# Allegro board pocketbeagle2 revA_241205.brd
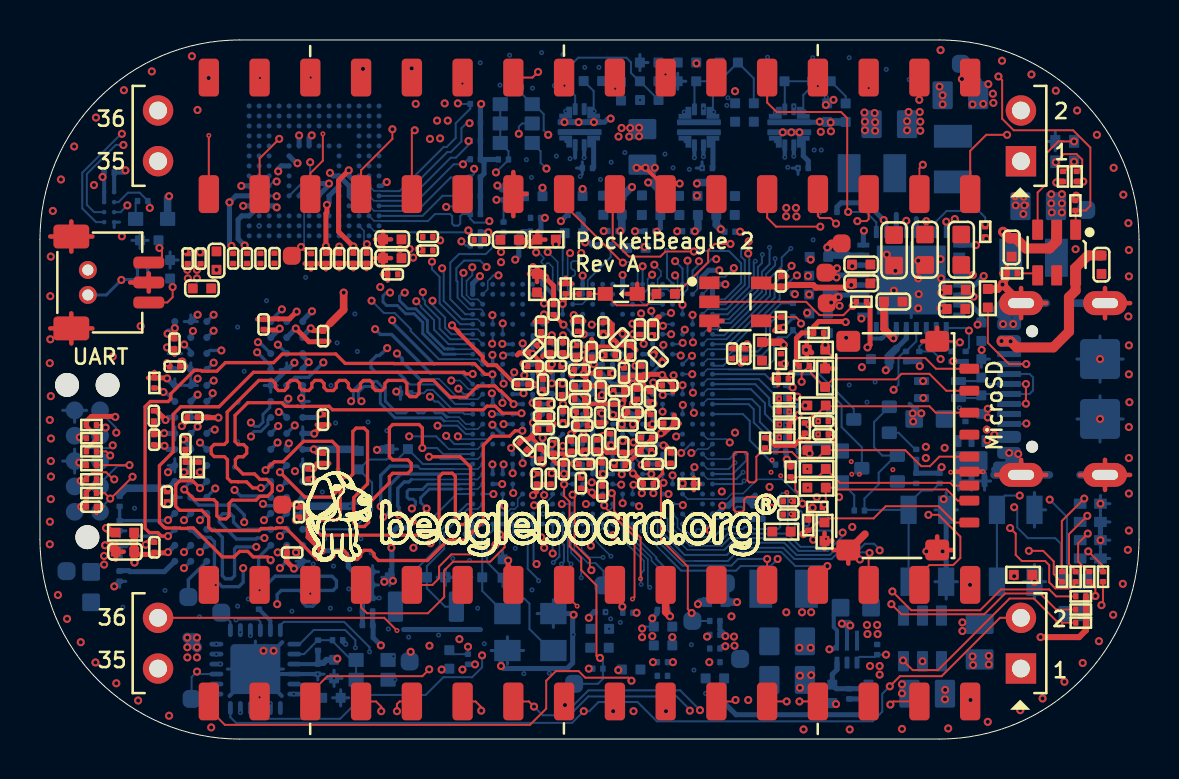
[diagram p0: board, top side]
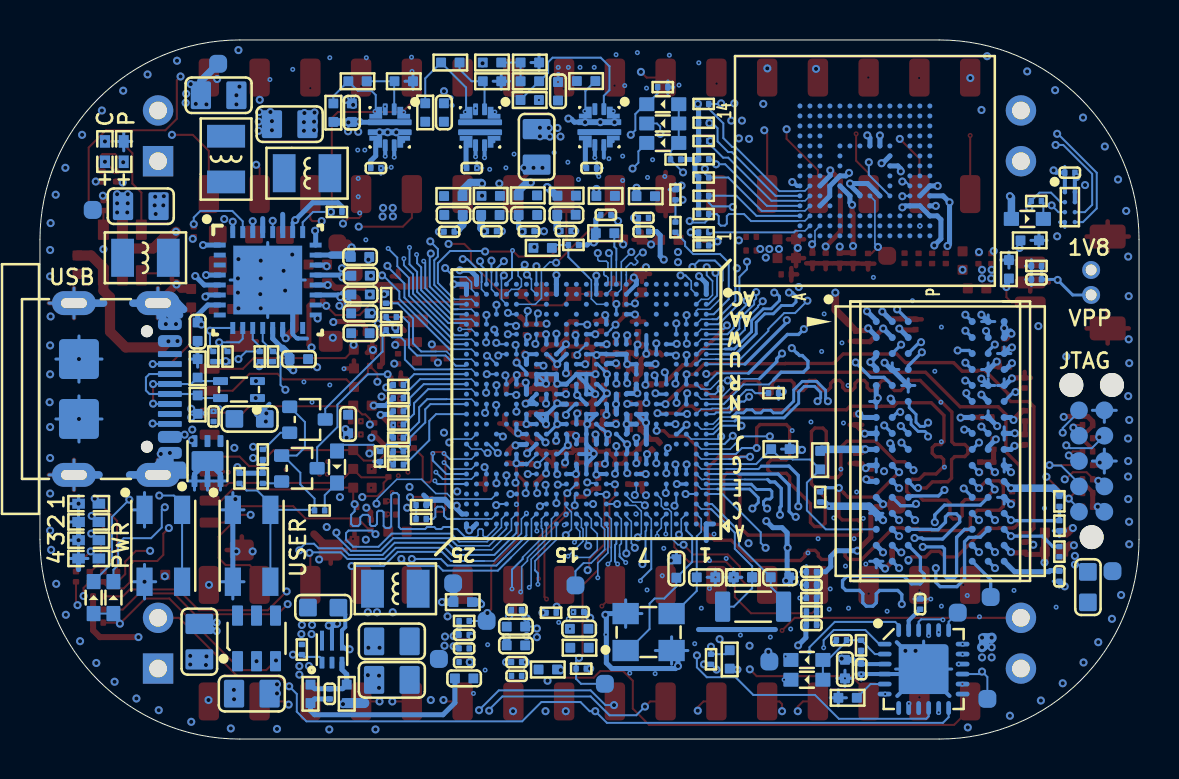
[diagram p1: board, bottom side, seen from below]

Outline 55 x 35 mm; copper layers: TOP, LYR2_GND, LYR3, LAY4_G, LAY5_PWR1, LAY6_PWR2, LYR7, LAY8, LYR9_GND, BOTTOM. Coordinates in mm from the lower left corner of the outline.
Outline path: 0,25 arc(2.93,32.07) 10,35 45,35 arc(52.07,32.07) 55,25 55,10 arc(52.07,2.93) 45,0 10,0 arc(2.93,2.93) 0,10 0,25

## Design rules (mm)
constraint set DEFAULT: min track width 0.102
net group DDR_LDQS: nets DDR_LDQS_N DDR_LDQS_P
net group DDR_UDQS: nets DDR_UDQS_N DDR_UDQS_P
net group DRXD: nets DRXD N17970480
net group EMMC_CLK: nets EMMC_CLK EMMC_CLK_S
net group GPIO0_4: nets GPIO0_4 N17713636
net group GPIO0_5: nets GPIO0_5 N17713634
net group N17714626: nets N17714626 N17714640
net group SD_PWR_EN: nets N17823731 SD_PWR_EN
net group USB0_DP: nets USB0_DM USB0_DP
net group USB1_DP: nets USB1_DM USB1_DP
net group USB_C_DP: nets USB_C_DM USB_C_DP
net group VDDA_1V8: nets VDDA_1V8 VDDA_PLL2
net group VIN_5V: nets N17852744 N17852767
net group AB10: nets AB10 N17951154 USB1_VBUS
net group DDR_ADDR: nets DDR_A0 DDR_A1 DDR_A2 DDR_A3 DDR_A4 DDR_A5 DDR_A6 DDR_A7 DDR_A8 DDR_A9 DDR_A10 DDR_A11 DDR_A12 DDR_A13 DDR_A14_WEN DDR_A15_CAS DDR_A16_RAS DDR_ACTN DDR_BA0 DDR_BA1 DDR_CKE DDR_CSN DDR_ODT DDR_PARITY DDR_RESET#
net group DDR_ADDR_1: nets DDR_ALERTN DDR_BG0 DDR_CLKN DDR_CLKP DDR_TEN
net group GPIO0_6: nets N17713632
net group MG1_DDR_D0: nets DDR_DQ0 DDR_DQ1 DDR_DQ2 DDR_DQ3 DDR_DQ4 DDR_DQ5 DDR_DQ6 DDR_DQ7 DDR_LDM
net group MG1_DDR_D1: nets DDR_DQ8 DDR_DQ9 DDR_DQ10 DDR_DQ11 DDR_DQ12 DDR_DQ13 DDR_DQ14 DDR_DQ15 DDR_UDM
net group POWER: nets A5 A18 A19 A20 AA19 AB20 AB22 AC21 AC24 AD18 AD22 AD23 AD24 AE21 AE22 AE23 AIN5 AIN7 B5 D14 D20 E14 GPIO0_3 GPIO0_6 J23 J25 MCU_GPIO0_1 MCU_SPI0_CLK MCU_SPI0_CS0 MCU_SPI0_D0 MCU_SPI0_D1 N20 VDD_1V8 VDD_SD WKUP_I2C0_SCL WKUP_I2C0_SDA Y25
net group PWR_BTN: nets PWR_BTN VDD_3V3_EN VSYS
net group RESETSTATZ: nets EMMC_RSTN GPIO1_50 N8502406 N17861988 PORZ_OUT RESETSTATZ
net group SD: nets SD_CLK SD_CMD SD_D0 SD_D1 SD_D2 SD_D3
net group USB_5V: nets N16646883 N17855551 N17855593
net group USER_BTN: nets BOOTMODE3 N17806286 USER_BTN
net group VBAT: nets CHG_N N17749261 N17856818 N17856864 N17856912 N17858761

## Placement (name value [footprint] x y rotation side)
C1  20pF  [C0402]  17.97 8.1 180 bottom
C2  20pF  [C0402]  19.82 8.1 0 bottom
C3  8pF  [C0402]  21.67 8.1 180 bottom
C4  8pF  [C0402]  23.15 8.54 90 bottom
C5  100nF  [C0201]  2.57 11.63 0 top
C6  1uF  [C0402]  53.12 23.75 270 top
C7  1uF  [C0402]  48.62 24.61 270 top
C8  100nF  [C0201]  3.46 28.36 0 bottom
C9  1uF  [C0402]  39.39 31.36 90 bottom
C10  1uF  [C0402]  34.79 31.37 90 bottom
C11  100pF  [C0201]  40.5 2.26 270 bottom
C12  10nF  [C0201]  38.19 28.59 180 bottom
C13  10nF  [C0201]  33.39 28.59 180 bottom
C14  10nF  [C0201]  27.4 28.59 180 bottom
C15  22uF  [C0805]  30.15 29.65 270 bottom
C16  1nF  [C0201]  14.89 4.95 0 bottom
C17  10uF  [C0402]  14.72 3.5 270 bottom
C18  100nF  [C0201]  13.9 3.5 270 bottom
C19  470nF  [C0201]  10.96 6.76 90 bottom
C20  1uF  [C0402]  29.08 32.43 90 bottom
C21  100nF  [C0201]  37.08 22.91 90 top
C22  100nF  [C0201]  5.13 23.01 0 bottom
C31  22uF  [C0805]  44.4 2.27 180 bottom
C32  22uF  [C0805]  47.02 4.88 270 bottom
C33  4.7uF  [C0402]  39.58 15.77 90 bottom
C34  100nF  [C0201]  39.2 15.25 180 top
C35  100nF  [C0201]  39.2 15.91 180 top
C44  10uF  [C0603]  44.51 16.03 180 bottom
C46  2.2uF  [C0402]  38.98 24.14 180 bottom
C47  2.2uF  [C0402]  38.96 23.2 180 bottom
C48  2.2uF  [C0402]  38.95 22.26 180 bottom
C49  2.2uF  [C0402]  47.11 20.39 270 bottom
C50  47uF  [C0805]  49.95 26.68 180 bottom
C52  2.2uF  [C0402]  42.7 21.9 0 top
C53  2.2uF  [C0402]  42.05 19.02 180 bottom
C54  47uF  [C0805]  42.5 30.78 0 bottom
C58  100nF  [C0201]  14.17 20.17 270 top
C59  100nF  [C0201]  5.72 9.6 90 top
C60  47uF  [C0805]  46.06 32.23 180 bottom
C62  10uF  [C0603]  46.1 24.5 90 top
C63  10uF  [C0603]  44.29 24.5 270 top
C64  10uF  [C0603]  42.74 24.47 270 top
C65  100nF  [C0201]  7.39 24.06 90 top
C66  100nF  [C0201]  8.04 24.05 90 top
C67  100nF  [C0201]  14.98 24.07 270 top
C68  100nF  [C0201]  14.31 24.07 270 top
C69  4.7uF  [C0402]  8.11 22.56 0 top
C70  100nF  [C0201]  10.36 24.06 270 top
C71  100nF  [C0201]  9.67 24.06 270 top
C72  100nF  [C0201]  11.03 24.06 270 top
C73  100nF  [C0201]  15.68 24.07 270 top
C74  100nF  [C0201]  11.73 24.07 270 top
C75  4.7uF  [C0402]  8.83 23.96 270 top
C76  100nF  [C0201]  16.34 24.07 270 top
C80  2.2uF  [C0402]  4.25 9.38 180 top
C81  10nF  [C0201]  6.74 18.65 0 top
C82  10nF  [C0201]  7.28 14.76 90 top
C99  10nF  [C0201]  13.43 13.27 90 top
C100  10nF  [C0201]  5.72 14.99 90 top
C101  10nF  [C0201]  3.99 8.15 270 bottom
C102  10nF  [C0201]  6.73 19.79 270 top
C103  2.2uF  [C0402]  45.87 22.49 180 top
C109  22uF  [C0603]  2.56 7.61 270 bottom
C112  2.2uF  [C0402]  41.09 22.82 0 top
C113  2.2uF  [C0402]  45.84 21.53 180 top
C114  10nF  [C0201]  11.19 20.76 90 top
C115  10nF  [C0201]  5.7 16.18 270 top
C116  10nF  [C0201]  14.17 15.99 270 top
C117  10nF  [C0201]  12.62 9.34 180 top
C118  10nF  [C0201]  6.35 12.13 270 top
C119  10nF  [C0201]  7.63 16.11 180 top
C120  10nF  [C0201]  14.17 14.06 270 top
C121  100nF  [C0201]  16.39 5.71 180 bottom
C122  100nF  [C0201]  16.39 7.71 0 bottom
C123  100nF  [C0201]  12.97 11.36 270 top
C124  100nF  [C0201]  16.39 8.37 0 bottom
C125  2.2uF  [C0402]  41.1 23.76 0 top
C130  100nF  [C0201]  46.31 16.15 90 bottom
C132  10uF  [C0402]  38.97 21.31 180 bottom
C133  10uF  [C0603]  40.83 6.58 180 bottom
C134  22uF  [C0805]  37.39 2.96 0 bottom
C135  22uF  [C0805]  37.39 4.89 0 bottom
C136  1uF  [C0201]  25.56 13.02 270 top
C137  1uF  [C0201]  27.23 13.77 0 top
C138  1uF  [C0201]  31.56 14.07 270 top
C139  1uF  [C0201]  30.66 13.77 0 top
C140  1uF  [C0201]  24.66 18.67 0 top
C141  1uF  [C0201]  31.4 17.7 0 top
C142  1uF  [C0201]  30.02 20.51 90 top
C143  1uF  [C0201]  30.35 15.09 0 top
C144  1uF  [C0201]  29.03 13.71 0 top
C145  100nF  [C0201]  28.04 6.36 0 bottom
C146  10nF  [C0201]  24.86 13.03 270 top
C147  4.7uF  [C0402]  28.02 5.52 0 bottom
C148  100nF  [C0201]  34.52 25.4 180 bottom
C149  10nF  [C0201]  28.53 19.21 0 top
C150  4.7uF  [C0402]  34.31 26.24 180 bottom
C151  100nF  [C0201]  30.53 25.42 0 bottom
C152  10nF  [C0201]  26.84 19.45 270 top
C153  4.7uF  [C0402]  30.58 26.24 0 bottom
C154  100nF  [C0201]  30.44 12.78 0 top
C155  100nF  [C0201]  24.8 26.09 0 bottom
C156  10nF  [C0201]  25.82 18.68 180 top
C157  1uF  [C0201]  24.79 25.41 0 bottom
C158  100nF  [C0201]  34.64 19.3 90 top
C159  10nF  [C0201]  28.27 18.32 180 top
C160  1uF  [C0201]  35.3 19.29 90 top
C161  100nF  [C0201]  37.45 11.9 0 top
C162  10nF  [C0201]  28.03 16.1 270 top
C163  1uF  [C0201]  37.45 11.24 0 top
C164  100nF  [C0201]  31.15 3.85 0 bottom
C165  10nF  [C0201]  26.19 16.14 90 top
C166  1uF  [C0201]  31.15 3.17 0 bottom
C167  100nF  [C0201]  26.18 19.6 270 top
C168  10nF  [C0201]  25.54 19.6 270 top
C169  1uF  [C0201]  26.68 26.25 0 bottom
C170  100nF  [C0201]  32.41 25.42 0 bottom
C171  10nF  [C0201]  28.19 20.61 90 top
C172  4.7uF  [C0402]  32.46 26.24 0 bottom
C173  100nF  [C0201]  28.68 25.43 0 bottom
C174  10nF  [C0201]  25.71 21.5 90 top
C175  4.7uF  [C0402]  28.65 26.25 0 bottom
C176  100nF  [C0201]  28.07 17.42 90 top
C177  1uF  [C0201]  31.16 6.47 0 bottom
C178  4.7uF  [C0402]  38.97 20.32 180 bottom
C179  4.7uF  [C0402]  31.18 5.63 0 bottom
C180  100nF  [C0201]  27.88 14.72 270 top
C181  100nF  [C0201]  25.07 20.65 90 top
C182  100nF  [C0201]  25.23 16.8 180 top
C183  100nF  [C0201]  28.54 15.02 270 top
C184  100nF  [C0201]  29.65 16.36 0 top
C185  100nF  [C0201]  26.59 14.67 270 top
C186  100nF  [C0201]  29.87 17.27 90 top
C187  100nF  [C0201]  27.09 16.36 0 top
C188  100nF  [C0201]  29.4 15.7 0 top
C189  100nF  [C0201]  27.14 15.7 0 top
C190  100nF  [C0201]  29.54 19.45 90 top
C191  100nF  [C0201]  29.23 18.33 270 top
C192  100nF  [C0201]  26.99 18.49 0 top
C193  100nF  [C0201]  24.69 19.53 225 top
C194  100nF  [C0201]  25.04 14.27 90 top
C195  100nF  [C0201]  27.04 17.68 0 top
C196  100nF  [C0201]  27.01 17.02 0 top
C197  100nF  [C0201]  26.11 17.49 270 top
C198  100nF  [C0201]  27.61 19.38 90 top
C199  100nF  [C0201]  28.73 16.5 90 top
C200  100nF  [C0201]  28.97 17.42 0 top
C201  100nF  [C0201]  29.19 14.61 270 top
C202  100nF  [C0201]  27.22 14.72 270 top
C203  10uF  [C0402]  31.18 4.69 0 bottom
C205  100nF  [C0201]  24.19 14.67 135 top
C206  10uF  [C0402]  33.77 3.04 180 bottom
C207  1uF  [C0201]  33.77 3.85 180 bottom
C208  100nF  [C0201]  26.92 20.67 90 top
C209  100nF  [C0201]  33.77 4.54 180 bottom
C210  100nF  [C0201]  28.12 13.57 90 top
C211  100nF  [C0201]  31.47 15.8 0 top
C212  100nF  [C0201]  25.7 14.57 270 top
C213  100nF  [C0201]  30.56 16 90 top
C214  4.7uF  [C0402]  23.5 24.99 0 top
C215  1uF  [C0201]  21.98 24.99 180 top
C216  100nF  [C0201]  26.21 13.51 90 top
C217  100nF  [C0201]  30.12 18.42 270 top
C218  100nF  [C0201]  30.53 17.14 90 top
C219  100nF  [C0201]  30.33 14.44 180 top
C220  100nF  [C0201]  28.97 20.08 225 top
C221  100nF  [C0201]  27.07 12.81 270 top
C222  100nF  [C0201]  30.94 19.13 135 top
C223  100nF  [C0201]  30.68 20.49 90 top
C224  4.7uF  [C0402]  17.63 24.08 180 top
C225  1uF  [C0201]  17.65 23.27 180 top
C226  100nF  [C0201]  25.17 17.75 90 top
C227  100nF  [C0201]  25.23 16.16 180 top
C228  100nF  [C0201]  25.21 15.52 180 top
C229  100nF  [C0201]  19.41 24.46 0 top
C230  100nF  [C0201]  19.41 25.14 0 top
C231  10uF  [C0402]  17.63 25.02 180 top
C270  100nF  [C0201]  33.77 5.22 180 bottom
C272  100nF  [C0201]  28.14 12.41 270 top
C273  100nF  [C0201]  24.16 17.76 180 top
D1  LRB520S-30T1G  [SOD_523]  40.13 13.62 270 bottom
D2  TPD1E1B04DPYR  [D0402]  38.86 13.52 0 top
D3  MM5Z3V3T1G  [SOD_523]  29.09 22.29 180 top
D4  LRB520S-30T1G  [SOD_523]  16.62 2.97 0 bottom
D5  LRB520S-30T1G  [SOD_523]  16.62 3.96 0 bottom
D6  LRB520S-30T1G  [SOD_523]  5.59 26.04 180 bottom
D7  TPD1E1B04DPYR  [D0402]  5.47 24.97 0 bottom
D8  TPD1E1B04DPYR  [D0402]  6.51 23.52 270 bottom
D16  LRB520S-30T1G  [SOD_523]  51.32 7.08 90 bottom
D17  LRB520S-30T1G  [SOD_523]  52.31 7.08 90 bottom
D19  TPD1E1B04DPYR  [D0402]  38.83 19.49 0 top
D20  TPD1E1B04DPYR  [D0402]  39.29 18.09 270 top
D21  TPD1E1B04DPYR  [D0402]  38.86 16.7 0 top
D22  TPD1E1B04DPYR  [D0402]  38.86 14.46 0 top
D23  TPD1E1B04DPYR  [D0402]  38.86 12.58 0 top
D24  TPD1E1B04DPYR  [D0402]  47.11 18.56 270 bottom
D25  TPD1E1B04DPYR  [D0402]  47.11 16.74 90 bottom
D26  TPD1E1B04DPYR  [D0402]  39.26 10.38 90 top
D47  LRB520S-30T1G  [SOD_523]  23.83 31.78 0 bottom
D48  LRB520S-30T1G  [SOD_523]  23.83 30.82 0 bottom
D56  LRB520S-30T1G  [SOD_523]  23.83 29.84 0 bottom
FB4  120R  [L0402]  4.25 10.34 0 top
FB6  120R  [L0402]  28 4.57 180 bottom
FB7  120R  [L0402]  34.32 27.19 0 bottom
FB8  120R  [L0402]  30.59 27.22 180 bottom
FB9  120R  [L0402]  33.84 6.86 180 bottom
FB10  120R  [L0402]  24.68 27.18 180 bottom
FB11  120R  [L0402]  36.13 19.41 270 top
FB12  120R  [L0402]  37.11 10.38 180 top
FB13  120R  [L0402]  29.59 3.48 0 bottom
FB14  120R  [L0402]  26.69 27.19 180 bottom
FB15  120R  [L0402]  32.44 27.19 180 bottom
FB16  120R  [L0402]  28.64 27.2 180 bottom
J1  TC2050-IDC  [CONNECT10_1D27_12_4X6_7MM]  2.37 13.92 90 bottom
J2  Header 1x2 1.25mm  [HEADER2P_1D25_DIP]  2.4 22.86 270 bottom
J3  ST-TF-MR267  [SD-MICRO-ST-TF-MR267]  46.51 14.69 90 top
J4  3P-1.0mm  [JST3P_1D0_5X4_25X2_9MM]  5.44 22.86 270 top
J14  USB2.0 Type C  [USB2_0_TYPE_C]  48.55 17.52 180 bottom
L13  90R  [L2012]  45.04 17.5 0 bottom
L14  0.47uH  [L1008]  49.72 24.09 0 bottom
L16  0.47uH  [L1008]  45.69 29.04 90 bottom
L17  0.47uH  [L1008]  41.63 28.33 180 bottom
L18  0.47uH  [L1008]  37.21 7.53 180 bottom
LED1  Green  [LED0402]  52.56 11.78 0 bottom
LED2  Green  [LED0402]  52.56 10.87 0 bottom
LED3  Green  [LED0402]  52.56 9.96 0 bottom
LED4  Green  [LED0402]  52.56 9.04 0 bottom
LED5  Red  [LED0402]  50.81 29.41 90 bottom
LED6  Red  [LED0402]  51.75 29.41 90 bottom
NOREF  -  []  13.32 8.81 0 top
NOREF#2  -  []  -84.5 -265.86 0 top
P1  Header 2x18 2.54mm  [HEADER2X18P_2D54_SMD_PTH_MIRROR]  27.5 4.8 180 top
P2  Header 2x18 2.54mm  [HEADER2X18P_2D54_SMD_PTH_MIRROR]  27.5 30.2 180 top
Q1  CJ2101  [SOT323]  41.61 16 270 bottom
Q2  CJ2101  [SOT323]  42.02 13.56 270 bottom
R1  240R  [R0201]  5.72 17.83 90 top
R2  39.2R  [R0201]  7.95 13.61 90 top
R3  39.2R  [R0201]  7.29 13.61 90 top
R4  10K  [R0201]  3.99 9.38 90 bottom
R5  47K  [R0201]  21.79 31.8 180 bottom
R6  47K  [R0201]  21.79 29.94 180 bottom
R7  47K  [R0201]  21.79 28.11 180 bottom
R8  47K  [R0201]  21.79 26.28 180 bottom
R9  47K  [R0201]  21.79 25.37 180 bottom
R10  47K  [R0201]  21.79 30.86 180 bottom
R11  47K  [R0201]  21.79 29.03 180 bottom
R12  47K  [R0201]  21.79 27.2 180 bottom
R13  47K  [R0201]  21.79 24.71 180 bottom
R14  10K  [R0201]  23.19 29.02 0 bottom
R15  10K  [R0201]  13.56 24.06 270 top
R16  0R  [R0201]  23.2 25.63 90 bottom
R17  1K  [R0201]  51.14 8.13 90 top
R18  1K  [R0201]  51.82 8.13 90 top
R19  1K  [R0201]  52.51 8.13 90 top
R20  47K  [R0201]  23.2 27.25 90 bottom
R21  1K  [R0201]  53.2 8.13 90 top
R22  1K  [R0201]  51.88 28.17 90 top
R23  10K  [R0201]  27.92 3.52 0 bottom
R24  10K  [R0201]  33.77 5.91 180 bottom
R25  10K  [R0201]  52.09 6.48 180 top
R26  100K  [R0201]  5.13 23.68 0 bottom
R27  10K  [R0201]  52.09 7.14 180 top
R28  10K  [R0201]  45.02 13.05 270 bottom
R29  1K  [R0201]  41 11.44 180 bottom
R30  10K  [R0201]  38.24 18.68 0 top
R31  10K  [R0201]  2.57 15.06 180 top
R32  10K  [R0201]  2.57 13 180 top
R33  10K  [R0201]  2.57 14.4 0 top
R34  10K  [R0201]  2.57 12.32 0 top
R35  10K  [R0201]  2.57 15.72 0 top
R36  10K  [R0201]  2.57 13.71 180 top
R37  470K  [R0402]  35.72 31.37 90 bottom
R38  1K  [R0201]  51.19 28.17 90 top
R39  68K  [R0402]  34.46 33.87 180 bottom
R40  150K  [R0402]  32.38 32.93 180 bottom
R41  432K  [R0402]  27.67 32.94 180 bottom
R42  78.7k  [R0402]  30.49 31.99 0 bottom
R43  180K  [R0402]  30.49 32.93 0 bottom
R44  100K  [R0402]  14.58 2.07 180 bottom
R45  10K  [R0201]  13.91 4.69 90 bottom
R46  1K  [R0201]  48.65 23.32 180 top
R47  10K  [R0201]  51.81 26.72 90 top
R48  0R  [R0201]  29.42 6.32 0 bottom
R49  10K  [R0201]  37.07 15.09 0 bottom
R50  1K  [R0201]  43.85 13.05 270 bottom
R51  10K  [R0201]  45.61 19.15 90 bottom
R52  499R  [R0402]  25.35 25.01 180 top
R53  0R  [R0402]  30.49 33.87 180 bottom
R54  10K  [R0201]  43.34 19.15 90 bottom
R55  470K  [R0402]  40.32 31.36 90 bottom
R56  68K  [R0402]  39.11 32.93 180 bottom
R57  150K  [R0402]  36.8 32.93 180 bottom
R58  1K  [R0201]  43.85 14.25 90 bottom
R59  10K  [R0201]  46.33 19.15 90 bottom
R60  10K  [R0201]  32.47 12.78 0 top
R61  10K  [R0201]  37.56 13.38 270 top
R62  0R  [R0402]  32.38 33.87 0 bottom
R63  10K  [R0201]  23.83 32.64 180 bottom
R64  0R  [R0201]  35.92 11.02 0 bottom
R65  10K  [R0201]  37.08 20.87 270 top
R66  0R  [R0402]  19.82 8.1 0 bottom
R67  1K  [R0201]  27.23 22.29 0 top
R68  20K  [R0402]  31.31 22.29 0 top
R69  10K  [R0201]  26.31 22.55 90 top
R70  47K  [R0201]  35.92 11.71 180 bottom
R71  1K  [R0201]  37.98 14.15 270 bottom
R72  47K  [R0201]  5.14 26.94 0 bottom
R79  10K  [R0201]  38.97 20.33 0 top
R81  1K  [R0201]  3.99 11.9 270 bottom
R82  10K  [R0201]  15.96 12.12 270 bottom
R83  1K  [R0201]  3.99 10.68 270 bottom
R84  2.2K  [R0402]  15.96 13.96 270 bottom
R85  2.2K  [R0402]  17.95 14.52 180 bottom
R86  1K  [R0201]  16.39 6.39 180 bottom
R87  1K  [R0201]  16.39 7.06 0 bottom
R88  240R  [R0201]  18.29 17.32 0 bottom
R89  10K  [R0201]  38.27 15.57 90 top
R90  10K  [R0201]  36.29 14.83 270 top
R91  10K  [R0201]  37.42 21.13 0 bottom
R92  10K  [R0201]  38.9 11.62 0 top
R93  10K  [R0201]  37.68 22.07 90 bottom
R94  10K  [R0201]  28.3 24.74 0 bottom
R95  10K  [R0201]  38.45 10.71 270 top
R96  10K  [R0201]  52.09 5.83 180 top
R128  5.1K  [R0402]  49.2 8.22 0 top
R129  5.1K  [R0402]  47.43 22.07 90 top
R130  499R  [R0402]  24.88 22.83 90 top
R131  499R  [R0402]  26.72 25.33 0 bottom
R132  20K  [R0402]  29.84 24.59 0 bottom
R137  10K  [R0201]  41.9 4.48 270 bottom
R139  100K  [R0201]  21.42 3.99 90 bottom
R141  15K  [R0402]  20.48 3.99 270 bottom
R159  10K  [R0201]  41.11 21.89 180 top
R160  10K  [R0201]  44 19.15 90 bottom
R161  10K  [R0201]  40.14 26.39 0 bottom
R170  10K  [R0201]  37.42 20.47 180 bottom
R172  10K  [R0201]  37.19 18.04 180 top
R173  10K  [R0201]  37.07 17.73 180 bottom
R174  10K  [R0201]  37.07 16.41 180 bottom
R177  10K  [R0201]  37.25 15.75 180 top
R180  10K  [R0201]  37.07 14.4 180 bottom
R182  10K  [R0201]  37.25 15.1 180 top
R183  10K  [R0201]  37.07 13.74 180 bottom
R188  10K  [R0201]  37.08 19.03 90 top
R192  10K  [R0201]  37.07 17.07 0 bottom
R193  10K  [R0201]  37.24 16.4 180 top
R195  10K  [R0201]  37.24 17.06 180 top
R196  10K  [R0201]  37.07 15.75 0 bottom
R228  10K  [R0201]  47.3 25.4 90 top
R260  560K  [R0402]  41.46 2.26 270 bottom
R261  124K  [R0402]  39.65 2.26 270 bottom
SW1  -  [SW_4P]  44.41 9.68 270 bottom
SW2  -  [SW_4P]  48.83 9.68 270 bottom
TP1  -  [TP35S_SMD]  12.6 24.19 0 top
TP2  -  [TP35S_SMD]  18.5 3.88 90 bottom
TP3  -  [TP35S_SMD]  28.2 7.69 270 bottom
TP4  -  [TP35S_SMD]  26.73 2.77 0 bottom
TP5  -  [TP35S_SMD]  32.65 5.92 0 bottom
TP6  -  [TP35S_SMD]  7.59 2.01 180 bottom
TP7  -  [TP35S_SMD]  9.07 6.33 180 bottom
TP11  -  [TP35S_SMD]  7.43 7.11 270 bottom
TP13  -  [TP35S_SMD]  12.12 11.73 90 top
TP18  -  [TP35S_SMD]  52.36 26.49 90 bottom
TP20  -  [TP35S_SMD]  46.08 33.81 180 bottom
TP21  -  [TP35S_SMD]  1.33 8.41 90 bottom
TP22  -  [TP35S_SMD]  34.32 7.8 90 bottom
TP23  -  [TP35S_SMD]  39.37 21.83 90 top
TP24  -  [TP35S_SMD]  39.3 23.35 90 top
TP25  -  [TP35S_SMD]  40.12 24.81 90 top
TP26  -  [TP35S_SMD]  35.04 4.01 180 bottom
U1  AM6232ASGGHAALW  [BGA425_0D5_13X13MM]  27.66 16.77 0 bottom
U2  4Gbit  [BGA96_T9_P8_10_3X13_3]  9.95 14.9 180 bottom
U3  EMMC04G-MT32-01G10  [BGA153_P14_P5_11P5X13]  13.72 28.44 90 bottom
U4  SN74LV1T125DBVR  [SOT23-5]  34.79 21.89 270 top
U5  BQ21040  [SOT23_6]  50.88 24.36 180 top
U6  TVS0500DRVR  [WSON6_0D65_2X2X0_8MM]  46.62 13.92 90 bottom
U7  LM73100RPWR  [VQFN10_0D45_2X2X1MM]  37.5 30.63 270 bottom
U8  TPS22918DBVR  [SOT23_6]  44.16 5.04 180 bottom
U9  LM73100RPWR  [VQFN10_0D45_2X2X1MM]  32.98 30.63 270 bottom
U10  LM73100RPWR  [VQFN10_0D45_2X2X1MM]  27.01 30.64 270 bottom
U11  MSPM0L1306SRGE  [VQFN24_0D5_4X4X1MM]  10.78 3.5 180 bottom
U12  TLV62595DMQR  [VSON6_0D5_1D5X1D5X1MM]  40.39 4.48 90 bottom
U13  SN74LVC2G241DCUR  [BAG8_0D5_1_91X0_91X0_5MM]  3.46 26.63 180 bottom
U17  TPS6521903RHBR  [QFN32_5X5MM_TPS65219]  43.6 22.98 180 bottom
X1  32.768kHz 12.5pF  [X2_SMD_3_2X1_5MM]  19.31 6.63 180 bottom
X2  25MHz  [X4-SMD-3_2X2_5X1_0MM]  24.54 5.36 180 bottom

## Library data of the parts
C1-C22 C31 C32 C44 C46-C50 C52-C54 C60 C62-C64 C80 C82 C103 C109 C112 C113 C125 C130 C132-C203 C205-C231 C270 C272 C273 = CC
C33 C69 C75 = CC: signal model: DEFAULT_CAPACITOR_4.7e+06pF_1_2
C34 C35 C58 C59 C65-C68 C70-C74 C76 C81 C99-C102 C114-C124 = CC: signal model: DEFAULT_CAPACITOR_100000pF_1_2
D1 D4-D6 D16 D17 D47 D48 D56 = D
D2 D7 D8 D19-D26 = DIODE TVS BI-DIR
D3 = D_zener
FB4 FB6-FB16 = FB
J1 = Header 2X5_1
J2 = Header 1x2
J3 = MicroSD Card_9+4P_ST-TF-MR267
J4 = XH 3+2P
J14 = USB2.0_Type C_16+6P#1
L13 = CL
L14 L16-L18 = L
LED1-LED6 = Single LED
P1 = Header 2x18 Of PocketBeagle2 P1
P2 = Header 2x18 Of PocketBeagle2 P2
Q1 Q2 = PMOS_123
R1-R4 R16-R19 R21-R63 R65-R69 R71 R72 R79 R81-R96 R128-R132 R137 R139 R141 R159-R161 R170 R172-R174 R177 R180 R182 R183 R188 R192 R193 R195 R196 R228 R260 R261 = R
R5-R13 R20 R70 = R: signal model: DEFAULT_RESISTOR_49900OHM_1_2
R14 R15 = R: signal model: DEFAULT_RESISTOR_10000OHM_1_2
R64 = R: signal model: R_R0201_DISCRETE_33R_33R
SW1 SW2 = Tactile Switch_4P
TP1-TP7 TP11 TP13 TP18 TP20-TP26 = Test Point
U1 = AM62x_BGA425
U2 = DDR4_FBGA96
U3 = eMMC_1
U4 = SN74LVC1G07DCK
U5 = BQ21040
U6 = TVS0500DRVR
U7 U9 U10 = LM73100RPWR
U8 = TPS22918DBV
U11 = MSPM0L110xxRGE
U12 = TLV62595DMQR
U13 = SN74LVC2G241YZP
U17 = TPS65219
X1 = XTAL_2P
X2 = XTAL_4P

## Footprints (pads in the part's own frame, mm; a bottom-side part is the same pattern mirrored in y, then rotated)
BAG8_0D5_1_91X0_91X0_5MM
  round 0.23 smd: A1(-0.25,0.75) A2(0.25,0.75) B1(-0.25,0.25) B2(0.25,0.25) C1(-0.25,-0.25) C2(0.25,-0.25) D1(-0.25,-0.75) D2(0.25,-0.75)
BGA96_T9_P8_10_3X13_3
  round 0.356 smd: A1(-3.2,6.001) A2(-2.4,6.001) A3(-1.6,6.001) A7(1.6,6.001) A8(2.4,6.001) A9(3.2,6.001) B1(-3.2,5.201) B2(-2.4,5.201) B3(-1.6,5.201) B7(1.6,5.201) B8(2.4,5.201) B9(3.2,5.201) C1(-3.2,4.401) C2(-2.4,4.401) C3(-1.6,4.401) C7(1.6,4.401) C8(2.4,4.401) C9(3.2,4.401) D1(-3.2,3.6) D2(-2.4,3.6) D3(-1.6,3.6) D7(1.6,3.6) D8(2.4,3.6) D9(3.2,3.6) E1(-3.2,2.8) E2(-2.4,2.8) E3(-1.6,2.8) E7(1.6,2.8) E8(2.4,2.8) E9(3.2,2.8) F1(-3.2,2) F2(-2.4,2) F3(-1.6,2) F7(1.6,2) F8(2.4,2) F9(3.2,2) G1(-3.2,1.2) G2(-2.4,1.2) G3(-1.6,1.2) G7(1.6,1.2) G8(2.4,1.2) G9(3.2,1.2) H1(-3.2,0.4) H2(-2.4,0.4) H3(-1.6,0.4) H7(1.6,0.4) H8(2.4,0.4) H9(3.2,0.4) J1(-3.2,-0.4) J2(-2.4,-0.4) J3(-1.6,-0.4) J7(1.6,-0.4) J8(2.4,-0.4) J9(3.2,-0.4) K1(-3.2,-1.2) K2(-2.4,-1.2) K3(-1.6,-1.2) K7(1.6,-1.2) K8(2.4,-1.2) K9(3.2,-1.2) L1(-3.2,-2) L2(-2.4,-2) L3(-1.6,-2) L7(1.6,-2) L8(2.4,-2) L9(3.2,-2) M1(-3.2,-2.8) M2(-2.4,-2.8) M3(-1.6,-2.8) M7(1.6,-2.8) M8(2.4,-2.8) M9(3.2,-2.8) N1(-3.2,-3.6) N2(-2.4,-3.6) N3(-1.6,-3.6) N7(1.6,-3.6) N8(2.4,-3.6) N9(3.2,-3.6) P1(-3.2,-4.401) P2(-2.4,-4.401) P3(-1.6,-4.401) P7(1.6,-4.401) P8(2.4,-4.401) P9(3.2,-4.401) R1(-3.2,-5.201) R2(-2.4,-5.201) R3(-1.6,-5.201) R7(1.6,-5.201) R8(2.4,-5.201) R9(3.2,-5.201) T1(-3.2,-6.001) T2(-2.4,-6.001) T3(-1.6,-6.001) T7(1.6,-6.001) T8(2.4,-6.001) T9(3.2,-6.001)
BGA153_P14_P5_11P5X13
  round 0.254 smd: A1(-3.25,3.25) A2(-2.75,3.25) A3(-2.25,3.25) A4(-1.75,3.25) A5(-1.25,3.25) A6(-0.75,3.25) A7(-0.25,3.25) A8(0.25,3.25) A9(0.75,3.25) A10(1.25,3.25) A11(1.75,3.25) A12(2.25,3.25) A13(2.75,3.25) A14(3.25,3.25) B1(-3.25,2.75) B2(-2.75,2.75) B3(-2.25,2.75) B4(-1.75,2.75) B5(-1.25,2.75) B6(-0.75,2.75) B7(-0.25,2.75) B8(0.25,2.75) B9(0.75,2.75) B10(1.25,2.75) B11(1.75,2.75) B12(2.25,2.75) B13(2.75,2.75) B14(3.25,2.75) C1(-3.25,2.25) C2(-2.75,2.25) C3(-2.25,2.25) C4(-1.75,2.25) C5(-1.25,2.25) C6(-0.75,2.25) C7(-0.25,2.25) C8(0.25,2.25) C9(0.75,2.25) C10(1.25,2.25) C11(1.75,2.25) C12(2.25,2.25) C13(2.75,2.25) C14(3.25,2.25) D1(-3.25,1.75) D2(-2.75,1.75) D3(-2.25,1.75) D4(-1.75,1.75) D12(2.25,1.75) D13(2.75,1.75) D14(3.25,1.75) E1(-3.25,1.25) E2(-2.75,1.25) E3(-2.25,1.25) E5(-1.25,1.25) E6(-0.75,1.25) E7(-0.25,1.25) E8(0.25,1.25) E9(0.75,1.25) E10(1.25,1.25) E12(2.25,1.25) E13(2.75,1.25) E14(3.25,1.25) F1(-3.25,0.75) F2(-2.75,0.75) F3(-2.25,0.75) F5(-1.25,0.75) F10(1.25,0.75) F12(2.25,0.75) F13(2.75,0.75) F14(3.25,0.75) G1(-3.25,0.25) G2(-2.75,0.25) G3(-2.25,0.25) G5(-1.25,0.25) G10(1.25,0.25) G12(2.25,0.25) G13(2.75,0.25) G14(3.25,0.25) H1(-3.25,-0.25) H2(-2.75,-0.25) H3(-2.25,-0.25) H5(-1.25,-0.25) H10(1.25,-0.25) H12(2.25,-0.25) H13(2.75,-0.25) H14(3.25,-0.25) J1(-3.25,-0.75) J2(-2.75,-0.75) J3(-2.25,-0.75) J5(-1.25,-0.75) J10(1.25,-0.75) J12(2.25,-0.75) J13(2.75,-0.75) J14(3.25,-0.75) K1(-3.25,-1.25) K2(-2.75,-1.25) K3(-2.25,-1.25) K5(-1.25,-1.25) K6(-0.75,-1.25) K7(-0.25,-1.25) K8(0.25,-1.25) K9(0.75,-1.25) K10(1.25,-1.25) K12(2.25,-1.25) K13(2.75,-1.25) K14(3.25,-1.25) L1(-3.25,-1.75) L2(-2.75,-1.75) L3(-2.25,-1.75) L12(2.25,-1.75) L13(2.75,-1.75) L14(3.25,-1.75) M1(-3.25,-2.25) M2(-2.75,-2.25) M3(-2.25,-2.25) M4(-1.75,-2.25) M5(-1.25,-2.25) M6(-0.75,-2.25) M7(-0.25,-2.25) M8(0.25,-2.25) M9(0.75,-2.25) M10(1.25,-2.25) M11(1.75,-2.25) M12(2.25,-2.25) M13(2.75,-2.25) M14(3.25,-2.25) N1(-3.25,-2.75) N2(-2.75,-2.75) N3(-2.25,-2.75) N4(-1.75,-2.75) N5(-1.25,-2.75) N6(-0.75,-2.75) N7(-0.25,-2.75) N8(0.25,-2.75) N9(0.75,-2.75) N10(1.25,-2.75) N11(1.75,-2.75) N12(2.25,-2.75) N13(2.75,-2.75) N14(3.25,-2.75) P1(-3.25,-3.25) P2(-2.75,-3.25) P3(-2.25,-3.25) P4(-1.75,-3.25) P5(-1.25,-3.25) P6(-0.75,-3.25) P7(-0.25,-3.25) P8(0.25,-3.25) P9(0.75,-3.25) P10(1.25,-3.25) P11(1.75,-3.25) P12(2.25,-3.25) P13(2.75,-3.25) P14(3.25,-3.25)
BGA425_0D5_13X13MM
  round 0.254 smd: A1(-6,6) A2(-5.5,6) A3(-5,6) A4(-4.5,6) A5(-4,6) A6(-3.5,6) A7(-3,6) A8(-2.5,6) A9(-2,6) A10(-1.5,6) A11(-1,6) A12(-0.5,6) A13(0,6) A14(0.5,6) A15(1,6) A16(1.5,6) A17(2,6) A18(2.5,6) A19(3,6) A20(3.5,6) A21(4,6) A22(4.5,6) A23(5,6) A24(5.5,6) A25(6,6) AA1(-6,-4) AA2(-5.5,-4) AA3(-5,-4) AA5(-4,-4) AA7(-3,-4) AA8(-2.5,-4) AA11(-1,-4) AA12(-0.5,-4) AA14(0.5,-4) AA15(1,-4) AA18(2.5,-4) AA19(3,-4) AA21(4,-4) AA23(5,-4) AA24(5.5,-4) AA25(6,-4) AB1(-6,-4.5) AB2(-5.5,-4.5) AB4(-4.5,-4.5) AB6(-3.5,-4.5) AB9(-2,-4.5) AB10(-1.5,-4.5) AB12(-0.5,-4.5) AB14(0.5,-4.5) AB16(1.5,-4.5) AB17(2,-4.5) AB20(3.5,-4.5) AB22(4.5,-4.5) AB24(5.5,-4.5) AB25(6,-4.5) AC1(-6,-5) AC2(-5.5,-5) AC5(-4,-5) AC6(-3.5,-5) AC9(-2,-5) AC11(-1,-5) AC13(0,-5) AC15(1,-5) AC17(2,-5) AC20(3.5,-5) AC21(4,-5) AC24(5.5,-5) AC25(6,-5) AD1(-6,-5.5) AD2(-5.5,-5.5) AD3(-5,-5.5) AD4(-4.5,-5.5) AD5(-4,-5.5) AD6(-3.5,-5.5) AD7(-3,-5.5) AD8(-2.5,-5.5) AD9(-2,-5.5) AD10(-1.5,-5.5) AD11(-1,-5.5) AD12(-0.5,-5.5) AD13(0,-5.5) AD14(0.5,-5.5) AD15(1,-5.5) AD16(1.5,-5.5) AD17(2,-5.5) AD18(2.5,-5.5) AD19(3,-5.5) AD20(3.5,-5.5) AD21(4,-5.5) AD22(4.5,-5.5) AD23(5,-5.5) AD24(5.5,-5.5) AD25(6,-5.5) AE1(-6,-6) AE2(-5.5,-6) AE3(-5,-6) AE4(-4.5,-6) AE5(-4,-6) AE6(-3.5,-6) AE7(-3,-6) AE8(-2.5,-6) AE9(-2,-6) AE10(-1.5,-6) AE11(-1,-6) AE12(-0.5,-6) AE13(0,-6) AE14(0.5,-6) AE15(1,-6) AE16(1.5,-6) AE17(2,-6) AE18(2.5,-6) AE19(3,-6) AE20(3.5,-6) AE21(4,-6) AE22(4.5,-6) AE23(5,-6) AE24(5.5,-6) AE25(6,-6) B1(-6,5.5) B2(-5.5,5.5) B3(-5,5.5) B4(-4.5,5.5) B5(-4,5.5) B6(-3.5,5.5) B7(-3,5.5) B8(-2.5,5.5) B9(-2,5.5) B10(-1.5,5.5) B11(-1,5.5) B12(-0.5,5.5) B13(0,5.5) B14(0.5,5.5) B15(1,5.5) B16(1.5,5.5) B17(2,5.5) B18(2.5,5.5) B19(3,5.5) B20(3.5,5.5) B21(4,5.5) B22(4.5,5.5) B23(5,5.5) B24(5.5,5.5) B25(6,5.5) C1(-6,5) C2(-5.5,5) C5(-4,5) C6(-3.5,5) C9(-2,5) C11(-1,5) C13(0,5) C15(1,5) C17(2,5) C20(3.5,5) C21(4,5) C24(5.5,5) C25(6,5) D1(-6,4.5) D2(-5.5,4.5) D4(-4.5,4.5) D6(-3.5,4.5) D9(-2,4.5) D10(-1.5,4.5) D12(-0.5,4.5) D14(0.5,4.5) D16(1.5,4.5) D17(2,4.5) D20(3.5,4.5) D22(4.5,4.5) D24(5.5,4.5) D25(6,4.5) E1(-6,4) E2(-5.5,4) E3(-5,4) E5(-4,4) E7(-3,4) E8(-2.5,4) E11(-1,4) E12(-0.5,4) E14(0.5,4) E15(1,4) E18(2.5,4) E19(3,4) E21(4,4) E23(5,4) E24(5.5,4) E25(6,4) F1(-6,3.5) F2(-5.5,3.5) F3(-5,3.5) F4(-4.5,3.5) F6(-3.5,3.5) F8(-2.5,3.5) F11(-1,3.5) F13(0,3.5) F15(1,3.5) F18(2.5,3.5) F20(3.5,3.5) F22(4.5,3.5) F23(5,3.5) F24(5.5,3.5) F25(6,3.5) G1(-6,3) G2(-5.5,3) G5(-4,3) G7(-3,3) G9(-2,3) G10(-1.5,3) G12(-0.5,3) G13(0,3) G14(0.5,3) G16(1.5,3) G17(2,3) G19(3,3) G21(4,3) G24(5.5,3) G25(6,3) H1(-6,2.5) H2(-5.5,2.5) H5(-4,2.5) H6(-3.5,2.5) H8(-2.5,2.5) H9(-2,2.5) H10(-1.5,2.5) H11(-1,2.5) H13(0,2.5) H15(1,2.5) H16(1.5,2.5) H17(2,2.5) H18(2.5,2.5) H20(3.5,2.5) H21(4,2.5) H24(5.5,2.5) H25(6,2.5) J1(-6,2) J2(-5.5,2) J3(-5,2) J4(-4.5,2) J7(-3,2) J8(-2.5,2) J11(-1,2) J12(-0.5,2) J13(0,2) J14(0.5,2) J18(2.5,2) J19(3,2) J22(4.5,2) J23(5,2) J24(5.5,2) J25(6,2) K1(-6,1.5) K2(-5.5,1.5) K3(-5,1.5) K4(-4.5,1.5) K7(-3,1.5) K9(-2,1.5) K10(-1.5,1.5) K13(0,1.5) K15(1,1.5) K16(1.5,1.5) K17(2,1.5) K18(2.5,1.5) K19(3,1.5) K22(4.5,1.5) K24(5.5,1.5) K25(6,1.5) L1(-6,1) L2(-5.5,1) L5(-4,1) L6(-3.5,1) L8(-2.5,1) L11(-1,1) L12(-0.5,1) L14(0.5,1) L15(1,1) L18(2.5,1) L20(3.5,1) L21(4,1) L23(5,1) L24(5.5,1) L25(6,1) M1(-6,0.5) M2(-5.5,0.5) M4(-4.5,0.5) M5(-4,0.5) M7(-3,0.5) M8(-2.5,0.5) M9(-2,0.5) M10(-1.5,0.5) M12(-0.5,0.5) M13(0,0.5) M16(1.5,0.5) M17(2,0.5) M18(2.5,0.5) M19(3,0.5) M21(4,0.5) M22(4.5,0.5) M24(5.5,0.5) M25(6,0.5) N1(-6,0) N2(-5.5,0) N3(-5,0) N6(-3.5,0) N8(-2.5,0) N11(-1,0) N12(-0.5,0) N13(0,0) N14(0.5,0) N15(1,0) N18(2.5,0) N20(3.5,0) N23(5,0) N24(5.5,0) N25(6,0) P1(-6,-0.5) P2(-5.5,-0.5) P4(-4.5,-0.5) P5(-4,-0.5) P7(-3,-0.5) P9(-2,-0.5) P10(-1.5,-0.5) P13(0,-0.5) P16(1.5,-0.5) P17(2,-0.5) P18(2.5,-0.5) P19(3,-0.5) P21(4,-0.5) P22(4.5,-0.5) P24(5.5,-0.5) P25(6,-0.5) R1(-6,-1) R2(-5.5,-1) R3(-5,-1) R5(-4,-1) R6(-3.5,-1) R8(-2.5,-1) R11(-1,-1) R12(-0.5,-1) R13(0,-1) R14(0.5,-1) R15(1,-1) R18(2.5,-1) R20(3.5,-1) R21(4,-1) R23(5,-1) R24(5.5,-1) R25(6,-1) T1(-6,-1.5) T2(-5.5,-1.5) T4(-4.5,-1.5) T7(-3,-1.5) T8(-2.5,-1.5) T9(-2,-1.5) T10(-1.5,-1.5) T13(0,-1.5) T14(0.5,-1.5) T16(1.5,-1.5) T17(2,-1.5) T18(2.5,-1.5) T19(3,-1.5) T22(4.5,-1.5) T24(5.5,-1.5) T25(6,-1.5) U1(-6,-2) U2(-5.5,-2) U3(-5,-2) U4(-4.5,-2) U7(-3,-2) U8(-2.5,-2) U11(-1,-2) U12(-0.5,-2) U14(0.5,-2) U15(1,-2) U18(2.5,-2) U19(3,-2) U22(4.5,-2) U23(5,-2) U24(5.5,-2) U25(6,-2) V1(-6,-2.5) V2(-5.5,-2.5) V5(-4,-2.5) V6(-3.5,-2.5) V8(-2.5,-2.5) V9(-2,-2.5) V10(-1.5,-2.5) V11(-1,-2.5) V13(0,-2.5) V15(1,-2.5) V16(1.5,-2.5) V17(2,-2.5) V18(2.5,-2.5) V20(3.5,-2.5) V21(4,-2.5) V24(5.5,-2.5) V25(6,-2.5) W1(-6,-3) W2(-5.5,-3) W5(-4,-3) W7(-3,-3) W9(-2,-3) W10(-1.5,-3) W12(-0.5,-3) W13(0,-3) W14(0.5,-3) W16(1.5,-3) W17(2,-3) W19(3,-3) W21(4,-3) W24(5.5,-3) W25(6,-3) Y1(-6,-3.5) Y2(-5.5,-3.5) Y3(-5,-3.5) Y4(-4.5,-3.5) Y6(-3.5,-3.5) Y8(-2.5,-3.5) Y11(-1,-3.5) Y13(0,-3.5) Y15(1,-3.5) Y18(2.5,-3.5) Y20(3.5,-3.5) Y22(4.5,-3.5) Y23(5,-3.5) Y24(5.5,-3.5) Y25(6,-3.5)
C0201
  rrect 0.279x0.318 smd: 1(-0.255,0) 2(0.255,0)
C0402
  rrect 0.5x0.5 smd: 1(-0.463,0) 2(0.463,0)
C0603
  rrect 0.889x0.889 smd: 1(-0.762,0) 2(0.762,0)
C0805
  rrect 1.016x1.397 smd: 1(-0.889,0) 2(0.889,0)
CONNECT10_1D27_12_4X6_7MM
  round 1.2 hole 1.2 unplated: (-3.81,0) (3.81,-1.015) (3.81,1.015)
  round 0.89 smd: 1(-2.54,-0.635) 2(-1.27,-0.635) 3(0,-0.635) 4(1.27,-0.635) 5(2.54,-0.635) 6(2.54,0.635) 7(1.27,0.635) 8(0,0.635) 9(-1.27,0.635) 10(-2.54,0.635)
D0402
  rrect 0.5x0.5 smd: 1(-0.463,0) 2(0.463,0)
HEADER2P_1D25_DIP
  round 0.9 hole 0.55: 1(0.625,0) 2(-0.625,0)
HEADER2X18P_2D54_SMD_PTH_MIRROR
  rect 1.524x1.524 hole 0.889: 1(-21.59,1.27)
  round 1.524 hole 0.889: 2(-21.59,-1.27) 35(21.59,1.27) 36(21.59,-1.27)
  rrect 1.02x1.9 smd: 3(-19.05,2.917) 4(-19.05,-2.917) 5(-16.51,2.917) 6(-16.51,-2.917) 7(-13.97,2.917) 8(-13.97,-2.917) 9(-11.43,2.917) 10(-11.43,-2.917) 11(-8.89,2.917) 12(-8.89,-2.917) 13(-6.35,2.917) 14(-6.35,-2.917) 15(-3.81,2.917) 16(-3.81,-2.917) 17(-1.27,2.917) 18(-1.27,-2.917) 19(1.27,2.917) 20(1.27,-2.917) 21(3.81,2.917) 22(3.81,-2.917) 23(6.35,2.917) 24(6.35,-2.917) 25(8.89,2.917) 26(8.89,-2.917) 27(11.43,2.917) 28(11.43,-2.917) 29(13.97,2.917) 30(13.97,-2.917) 31(16.51,2.917) 32(16.51,-2.917) 33(19.05,2.917) 34(19.05,-2.917)
JST3P_1D0_5X4_25X2_9MM
  rrect 0.6x1.55 smd: 1(-1,0) 2(0,0) 3(1,0)
  rrect 1.2x1.8 smd: 4(-2.3,-3.875) 5(2.3,-3.875)
L0402
  rrect 0.5x0.5 smd: 1(-0.463,0) 2(0.463,0)
L1008
  rect 1.143x1.905 smd: 1(-1.143,0) 2(1.143,0)
L2012
  rrect 0.75x0.4 smd: 1(-0.925,0.425) 2(0.925,0.425) 3(0.925,-0.425) 4(-0.925,-0.425)
LED0402
  rect 0.635x0.508 smd: 1(-0.508,0) 2(0.508,0)
QFN32_5X5MM_TPS65219
  rect 0.6x0.25 smd: 1(-2.4,1.75) 2(-2.4,1.25) 3(-2.4,0.75) 4(-2.4,0.25) 5(-2.4,-0.25) 6(-2.4,-0.75) 7(-2.4,-1.25) 8(-2.4,-1.75) 17(2.4,-1.75) 18(2.4,-1.25) 19(2.4,-0.75) 20(2.4,-0.25) 21(2.4,0.25) 22(2.4,0.75) 23(2.4,1.25) 24(2.4,1.75)
  rect 0.25x0.6 smd: 9(-1.75,-2.4) 10(-1.25,-2.4) 11(-0.75,-2.4) 12(-0.25,-2.4) 13(0.25,-2.4) 14(0.75,-2.4) 15(1.25,-2.4) 16(1.75,-2.4) 25(1.75,2.4) 26(1.25,2.4) 27(0.75,2.4) 28(0.25,2.4) 29(-0.25,2.4) 30(-0.75,2.4) 31(-1.25,2.4) 32(-1.75,2.4)
  rect 3.45x3.45 smd: 33(0,0)
R0201
  rrect 0.279x0.318 smd: 1(-0.255,0) 2(0.255,0)
R0402
  rrect 0.5x0.5 smd: 1(-0.463,0) 2(0.463,0)
SD-MICRO-ST-TF-MR267
  rrect 0.5x1 smd: G1(-2,0) T1(3.85,0) T2(2.75,0) T3(1.65,0) T4(0.55,0) T5(-0.55,0) T6(-1.3,0) T7(-2.75,0) T8(-3.85,0)
  rrect 1.05x1.2 smd: S1(-5.225,1.61) S2(-5.225,6.06) S3(5.225,6.06) S4(5.225,1.61)
SOD_523
  rrect 0.762x0.7 smd: 1(-0.8,0) 2(0.8,0)
SOT23-5
  rect 0.635x1.016 smd: 1(-0.953,-1.295) 2(0,-1.295) 3(0.953,-1.295) 4(0.953,1.295) 5(-0.953,1.295)
SOT23_6
  rrect 0.55x1.016 smd: 1(-0.95,-1.143) 2(0,-1.143) 3(0.95,-1.143) 4(0.95,1.143) 5(0,1.143) 6(-0.95,1.143)
SOT323
  rrect 0.635x0.762 smd: 1(-0.635,-0.889) 2(0.665,-0.889) 3(0,0.889)
SW_4P
  rect 1.422x0.813 smd: 1(-1.8,-0.94) 2(-1.8,0.94) 3(1.8,-0.94) 4(1.8,0.94)
TP35S_SMD
  rrect 0.9x0.9 smd: 1(0,0)
USB2_0_TYPE_C
  round 0.6 hole 0.6 unplated: (-1.1,-2.89) (-1.1,2.89)
  rrect 1.2x0.3 smd: A5(0.05,1.25) A6(0.05,0.25) A7(0.05,-0.25) A8(0.05,-1.25) B5(0.05,-1.75) B6(0.05,-0.75) B7(0.05,0.75) B8(0.05,1.75)
  rrect 1.2x0.6 smd: B1(0.05,-3.2) B4(0.05,-2.4) B9(0.05,2.4) B12(0.05,3.25)
  oval 2.2x1.2 hole 1.3x0.5: S1(-4.75,4.3) S2(-0.55,4.3) S3(-4.75,-4.3) S4(-0.55,-4.3)
  rrect 2x2 smd: S5(-4.5,1.5) S6(-4.5,-1.5)
VQFN10_0D45_2X2X1MM
  custom 0.15x0.15 smd: 1(-0.725,0.7) 4(-0.725,-0.7) 7(0.725,-0.7) 10(0.725,0.7)
  rrect 0.6x0.25 smd: 2(-0.9,0.225) 3(-0.9,-0.225) 8(0.9,-0.225) 9(0.9,0.225)
  rrect 0.3x2.2 smd: 5(-0.25,0) 6(0.25,0)
VQFN24_0D5_4X4X1MM
  oval 0.7x0.24 smd: 1(-1.95,1.25) 2(-1.95,0.75) 3(-1.95,0.25) 4(-1.95,-0.25) 5(-1.95,-0.75) 6(-1.95,-1.25) 13(1.95,-1.25) 14(1.95,-0.75) 15(1.95,-0.25) 16(1.95,0.25) 17(1.95,0.75) 18(1.95,1.25)
  oval 0.24x0.7 smd: 7(-1.25,-1.95) 8(-0.75,-1.95) 9(-0.25,-1.95) 10(0.25,-1.95) 11(0.75,-1.95) 12(1.25,-1.95) 19(1.25,1.95) 20(0.75,1.95) 21(0.25,1.95) 22(-0.25,1.95) 23(-0.75,1.95) 24(-1.25,1.95)
  rrect 2.5x2.5 smd: 25(0,0)
VSON6_0D5_1D5X1D5X1MM
  rrect 0.6x0.25 smd: 1(-0.65,0.5) 2(-0.65,0) 3(-0.65,-0.5)
  rect 1x0.2 smd: 4(0.45,-0.5) 5(0.45,0) 6(0.45,0.5)
WSON6_0D65_2X2X0_8MM
  rrect 0.6x0.3 smd: 1(-1,0.65) 2(-1,0) 3(-1,-0.65) 4(1,-0.65) 5(1,0) 6(1,0.65)
  rrect 1x1.6 smd: 7(0,0)
X2_SMD_3_2X1_5MM
  rrect 0.762x1.524 smd: 1(-1.524,0) 2(1.524,0)
X4-SMD-3_2X2_5X1_0MM
  rect 1.321x1.067 smd: 1(-1.15,-0.925) 2(1.15,-0.925) 3(1.15,0.925) 4(-1.15,0.925)

## Nets
GND: C1.2 C2.2 C3.2 C4.2 C5.2 C6.2 C7.2 C8.2 C9.2 C10.2 C12.2 C13.2 C14.2 C15.2 C16.2 C17.2 C18.2 C19.2 C20.2 C21.2 C22.2 C31.2 C32.2 C33.2 C34.2 C35.2 C44.2 C46.2 C47.2 C48.2 C49.2 C50.2 C52.2 C53.2 C54.2 C58.2 C59.2 C60.2 C62.2 C63.2 C64.2 C65.2 C66.2 C67.2 C68.2 C69.2 C70.2 C71.2 C72.2 C73.2 C74.2 C75.2 C76.2 C80.2 C81.2 C99.2 C100.2 C101.2 C102.2 C103.2 C109.2 C112.2 C113.2 C114.2 C115.2 C116.2 C117.2 C118.2 C119.2 C120.2 C122.2 C123.2 C124.2 C125.2 C130.2 C132.2 C133.2 C134.2 C135.2 C136.2 C137.2 C138.2 C139.2 C140.2 C141.2 C142.2 C143.2 C144.2 C145.2 C146.2 C147.2 C148.2 C149.2 C150.2 C151.2 C152.2 C153.2 C154.2 C155.2 C156.2 C157.2 C158.2 C159.2 C160.2 C161.2 C162.2 C163.2 C164.2 C165.2 C166.2 C167.2 C168.2 C169.2 C170.2 C171.2 C172.2 C173.2 C174.2 C175.2 C176.2 C177.2 C178.2 C179.2 C180.2 C181.2 C182.2 C183.2 C184.2 C185.2 C186.2 C187.2 C188.2 C189.2 C190.2 C191.2 C192.2 C193.2 C194.2 C195.2 C196.2 C197.2 C198.2 C199.2 C200.2 C201.2 C202.2 C203.2 C205.2 C206.2 C207.2 C208.2 C209.2 C210.2 C211.2 C212.2 C213.2 C214.2 C215.2 C216.2 C217.2 C218.2 C219.2 C220.2 C221.2 C222.2 C223.2 C224.2 C225.2 C226.2 C227.2 C228.2 C229.2 C230.2 C231.2 C270.2 C272.2 C273.2 D2.1 D3.1 D7.1 D8.1 D19.1 D20.1 D21.1 D22.1 D23.1 D24.1 D25.1 D26.1 J1.3 J1.5 J3.S1 J3.S2 J3.S3 J3.S4 J3.T6(\VSS\) J4.2 J4.4 J4.5 J14.B1 J14.B12 J14.S1 J14.S2 J14.S3 J14.S4 J14.S5 J14.S6 LED1.2(\C\) LED2.2(\C\) LED3.2(\C\) LED4.2(\C\) LED5.2(\C\) P1.15 P1.16 P1.17 P1.22 P2.15 P2.21 R1.2 R15.2 R20.2 R26.2 R36.2 R40.2 R44.1 R46.2 R47.2 R49.2 R52.2 R53.2 R57.2 R60.2 R63.2 R65.2 R66.2 R69.2 R70.2 R71.2 R82.2 R83.2 R85.2 R87.2 R88.1 R91.2 R93.2 R94.1 R128.2 R129.2 R130.2 R131.2 R141.2 R170.2 R172.2 R188.2 R192.2 R193.2 R195.2 R196.2 R261.2 SW1.1 SW1.3 SW2.1 SW2.3 U1.A1 U1.A24 U1.A25 U1.AA11 U1.AB9 U1.AD1 U1.AD9 U1.AD12 U1.AD16 U1.AD25 U1.AE1 U1.AE8 U1.AE12 U1.AE16 U1.AE24 U1.AE25 U1.B25 U1.F13 U1.G13 U1.G19 U1.H13 U1.H16 U1.H18 U1.H20 U1.J7 U1.J13 U1.K7 U1.K13 U1.K15 U1.K19 U1.L20 U1.M7 U1.M8 U1.M10 U1.M12 U1.M13 U1.M17 U1.M18 U1.N15 U1.P7 U1.P10 U1.P13 U1.R13 U1.R15 U1.R18 U1.R20 U1.T8 U1.T13 U1.T14 U1.T16 U1.T17 U1.T18 U1.U8 U1.U19 U1.V9 U1.V10 U1.V11 U1.V13 U1.V16 U1.V18 U1.W7 U1.Y2 U2.A2 U2.A8 U2.B2 U2.C9 U2.D2 U2.D8 U2.E1 U2.E3 U2.E8 U2.E9 U2.F1 U2.G8 U2.H1 U2.H9 U2.K1 U2.K9 U2.M9 U2.N1 U2.T1 U3.A6 U3.C4 U3.E7 U3.G5 U3.H10 U3.J5 U3.K8 U3.N2 U3.N5 U3.P4 U3.P6 U4.3 U5.5(\VSS\) U6.1 U6.2 U6.3 U6.7(\PAD\) U7.8 U7.9 U8.2 U9.8 U9.9 U10.8 U10.9 U11.4(\VSS\) U11.25 U12.4 U13.A1 U13.D1 U17.15 U17.33 X2.2 X2.4
V21: P2.18 U1.V21
V24: P2.4 U1.V24
VBAT: C7.1 C20.1 P2.14 R38.1 R41.1 U5.2 U10.5
VDD_1V2: C54.1 C81.1 C82.2 C99.1 C100.1 C101.1 C102.1 C109.1 C114.1 C115.1 C116.1 C117.1 C118.1 C119.1 C120.1 C121.1 C224.1 C225.1 C226.1 C227.1 C228.1 C229.1 C230.1 C231.1 L17.2 R4.1 R81.1 R84.1 R86.1 TP21.1(\TP\) U1.K9 U1.L8 U1.M9 U1.P9 U1.R8 U2.A1 U2.A9 U2.B3 U2.B9 U2.C1 U2.D1 U2.D9 U2.F2 U2.F8 U2.G1 U2.G7 U2.G9 U2.J1 U2.J2 U2.J8 U2.J9 U2.L1 U2.L9 U2.R1 U2.T9 U17.24
VDD_1V8: C21.1 C60.1 C70.1 C71.1 C72.1 C73.1 C74.1 C75.1 C112.1 C214.1 C215.1 C216.1 C273.1 J2.2 L16.2 R5.1 R6.1 R7.1 R8.1 R9.1 R10.1 R11.1 R12.1 R13.1 R14.1 TP20.1(\TP\) U1.G10 U1.T7 U3.C6 U3.M4 U3.N4 U3.P3 U3.P5 U4.5 U17.20 U17.32
VDD_2V5: C46.1 FB4.1 TP25.1(\TP\) U17.23
VDD_3V3: C5.1 C8.1 C11.2 C17.1 C18.1 C31.1 C65.1 C66.1 C67.1 C68.1 C69.1 C103.1 C113.1 C125.1 C134.1 C135.1 C206.1 C207.1 C208.1 C209.1 C210.1 C211.1 C212.1 C213.1 C217.1 C218.1 C219.1 C220.1 C221.1 C222.1 C223.1 C270.1 C272.1 D6.1 J1.1 L18.2 P1.14 P2.23 R22.1 R23.1 R24.1 R25.1 R27.1 R28.1 R31.1 R32.1 R33.1 R34.1 R35.1 R45.1 R48.2 R50.1 R51.1 R54.1 R58.1 R59.1 R61.1 R96.1 R159.1 R160.1 R173.1 R174.1 R177.1 R180.1 R182.1 R183.1 R228.1 R260.2 TP26.1(\TP\) U1.F11 U1.F15 U1.G12 U1.G14 U1.H9 U1.J18 U1.K10 U1.L18 U1.M19 U1.N18 U1.P18 U1.T19 U1.U18 U1.W16 U1.W19 U1.Y13 U3.E6 U3.F5 U3.J10 U3.K9 U8.1 U11.3 U13.A2(\VCC\) U13.B2 U17.6 U17.22
VDD_3V3_EN: R137.2 U12.1 U17.17
VDD_3V3_SD: C32.1 C33.1 C34.1 C35.1 J3.T4 U8.5 U8.6(\VOUT\)
VDD_CANUART: C145.1 C146.1 C147.1 FB6.2 U1.F8
VDD_CORE: C50.1 C176.1 C177.1 C179.1 C180.1 C181.1 C182.1 C183.1 C184.1 C185.1 C186.1 C187.1 C188.1 C189.1 C190.1 C191.1 C192.1 C193.1 C194.1 C203.1 FB6.1 FB7.1 FB8.1 L14.2 TP18.1(\TP\) U1.H8 U1.J11 U1.J14 U1.K17 U1.L12 U1.L15 U1.M16 U1.N8 U1.N11 U1.N13 U1.P17 U1.R11 U1.R14 U1.U12 U1.V8 U1.V15 U1.V17 U17.1
VDD_SD: C49.1 FB9.1 R30.1 R79.1 R89.1 R90.1 R92.1 R95.1 TP22.1(\TP\) U17.7
VDDA_0V85: C48.1 C132.1 C178.1 C195.1 C196.1 C197.1 C198.1 C199.1 C200.1 C201.1 C202.1 TP23.1(\TP\) U1.J12 U1.K16 U1.N12 U1.N14 U1.P16 U1.R12 U1.T10 U1.U14 U17.19
VDDA_1V8: C47.1 C205.1 FB10.1 FB11.1 FB12.1 FB13.1 FB14.1 FB15.1 FB16.1 TP24.1(\TP\) U1.G7 U1.G16 U1.T9 U17.21
VDDA_1V8_CSIRX: C170.1 C171.1 C172.1 FB15.2 U1.W14
VDDA_1V8_MCU: C164.1 C165.1 C166.1 FB13.2 U1.L11
VDDA_1V8_OLDI: C167.1 C168.1 C169.1 FB14.2 U1.W9 U1.W10
VDDA_1V8_USB: C173.1 C174.1 C175.1 FB16.2 U1.Y11
VDDA_CORE_CSI: C148.1 C149.1 C150.1 FB7.2 U1.W13
VDDA_CORE_USB: C151.1 C152.1 C153.1 FB8.2 U1.W12
VDDA_PLL0: C155.1 C156.1 C157.1 FB10.2 U1.U11
VDDA_PLL1: C158.1 C159.1 C160.1 FB11.2 U1.U15
VDDA_PLL2: C161.1 C162.1 C163.1 FB12.2 U1.L14
VDDA_SYS_MON: R139.2 R141.1 U1.H10
VDDSHV5: C154.1 FB9.2 U1.G17
VIN_5V: C9.1 P1.1 R55.1 U7.5
A5: P2.7 U1.A5 U1.E15
A13: P2.31 U1.A13 U1.AA18
A14: P2.29 U1.A14 U1.M22
A15: P2.9 U1.A15 U1.D4
A17: P1.33 U1.A17 U1.AA23
A18: P1.10 U1.A18 U1.B19
A19: P1.12 U1.A19 U1.AE18
A20: P1.8 U1.A20
AA19: P1.2 U1.AA19(\RGMII2_TX_CTL\) U1.E18 U11.12
AA21: P2.34 U1.AA21
AA24: P2.30 U1.AA24
AA25: P2.33 U1.AA25
AB10: P1.5 R68.2
AB20: P1.25 U1.AB20 U11.18
AB22: P2.3 U1.AB22 U1.B18
AB24: P2.28 U1.AB24
AB25: P2.32 U1.AB25
AC20: P2.19 U1.AC20
AC21: P1.23 U1.AC21 U11.20
AC24: P2.17 U1.AC24
AC25: P2.22 U1.AC25
AD18: P1.6 U1.AD18 U1.E19
AD21: P2.10 U1.AD21
AD22: P1.19 U1.AD22 U11.22
AD23: P1.34 U1.AD23
AD24: P2.1 U1.AD24 U1.B20
AE21: P1.35 U1.AE21
AE22: P1.21 U1.AE22 U11.21
AE23: P1.27 U1.AE23 U11.17
AIN5: P2.35 U1.W21 U11.16
AIN7: P2.36 U1.C13 U11.11
B3: P1.28 U1.B3 U1.K22
B5: P2.5 U1.B5 U1.C15
B13: P2.27 U1.B13
B14: P2.25 U1.B14
B15: P2.11 U1.B15 U1.E5
B17: P1.36 U1.B17 U1.V20
BAT_TS: P2.16 R47.1 U5.1
BOOTMODE0: R183.2 U1.M25
BOOTMODE1: R182.2 U1.N23
BOOTMODE2: R49.1 U1.N24
BOOTMODE3: D1.1 R71.1 R180.2 U1.N25
BOOTMODE4: R196.1 U1.P24
BOOTMODE5: R195.1 U1.P22
BOOTMODE6: R177.2 U1.P21
BOOTMODE7: R193.1 U1.R23
BOOTMODE8: R192.1 U1.R24
BOOTMODE9: R174.2 U1.R25
BOOTMODE10: R173.2 U1.T25
BOOTMODE11: Q2.3 R172.1 U1.R21
BOOTMODE12: R188.1 U1.T22
BOOTMODE13: Q1.3 R170.1 U1.T24
BOOTMODE14: R91.1 U1.U25
BOOTMODE15: R93.1 U1.U24
CC1: J14.A5 R129.1
CC2: J14.B5 R128.1
CHG_N: LED6.2(\C\) U5.3
D6: P1.26 U1.D6 U1.K24
D14: P1.32 U1.D14
D20: P1.4 U1.D20 U1.Y18
DDR_A0: U1.J1 U2.P3
DDR_A1: U1.J2 U2.P7
DDR_A2: U1.K3 U2.R3
DDR_A3: U1.L5 U2.N7
DDR_A4: U1.K4 U2.N3
DDR_A5: U1.K1 U2.P8
DDR_A6: U1.R2 U2.P2
DDR_A7: U1.P2 U2.R8
DDR_A8: U1.P1 U2.R2
DDR_A9: U1.P4 U2.R7
DDR_A10: U1.R5 U2.M3
DDR_A11: U1.P5 U2.T2
DDR_A12: U1.R6 U2.M7
DDR_A13: U1.R1 U2.T8
DDR_A14_WEN: U1.N3 U2.L2
DDR_A15_CAS: U1.M4 U2.M8
DDR_A16_RAS: U1.M5 U2.L8
DDR_ACTN: U1.N6 U2.L3
DDR_ALERTN: R4.2 U1.R3 U2.P9
DDR_BA0: U1.M1 U2.N2
DDR_BA1: U1.N1 U2.N8
DDR_BG0: U1.T4 U2.M2
DDR_CKE: R82.1 U1.H2 U2.K2
DDR_CLKN: R3.1 U1.L2 U2.K8
DDR_CLKP: R2.1 U1.L1 U2.K7
DDR_CSN: U1.L6 U2.L7
DDR_DQ0: U1.F4 U2.G2
DDR_DQ1: U1.H6 U2.F7
DDR_DQ2: U1.F3 U2.H3
DDR_DQ3: U1.G2 U2.H7
DDR_DQ4: U1.G5 U2.H2
DDR_DQ5: U1.F1 U2.H8
DDR_DQ6: U1.E3 U2.J3
DDR_DQ7: U1.F2 U2.J7
DDR_DQ8: U1.U1 U2.A3
DDR_DQ9: U1.W2 U2.B8
DDR_DQ10: U1.W1 U2.C3
DDR_DQ11: U1.V5 U2.C7
DDR_DQ12: U1.V6 U2.C2
DDR_DQ13: U1.Y1 U2.C8
DDR_DQ14: U1.U3 U2.D3
DDR_DQ15: U1.U2 U2.D7
DDR_LDM: U1.H5 U2.E7
DDR_LDQS_N: U1.E2 U2.F3
DDR_LDQS_P: U1.E1 U2.G3
DDR_ODT: U1.H1 U2.K3
DDR_PARITY: U1.T1 U2.T3
DDR_RESET#: R84.2 R85.1 U1.G1 U2.P1
DDR_TEN: R81.2 R83.1 U2.N9
DDR_UDM: U1.W5 U2.E2
DDR_UDQS_N: U1.V2 U2.A7
DDR_UDQS_P: U1.V1 U2.B7
DDR_VPP: C58.1 C59.1 C80.1 FB4.2 U2.B1 U2.R9
DDR_VREFCA: C121.2 C122.1 C123.1 C124.1 R86.2 R87.1 TP13.1(\TP\) U2.M1
DRXD: D7.2 J4.1 R72.2 U13.B1
DTXD: D8.2 J4.3 U13.C1
E14: P1.30 U1.E14
EMMC_CLK: R16.1 U1.AB1
EMMC_CLK_S: R16.2 R20.1 U3.M6
EMMC_CMD: R13.2 U1.Y3 U3.M5
EMMC_D0: R12.2 U1.AA2 U3.A3
EMMC_D1: R11.2 U1.AA1 U3.A4
EMMC_D2: R10.2 U1.AA3 U3.A5
EMMC_D3: R9.2 U1.Y4 U3.B2
EMMC_D4: R8.2 U1.AB2 U3.B3
EMMC_D5: R7.2 U1.AC1 U3.B4
EMMC_D6: R6.2 U1.AD2 U3.B5
EMMC_D7: R5.2 U1.AC2 U3.B6
EMMC_RSTN: D56.2(\C\) U1.F23
EXTINTN: R160.2 U1.D16 U17.11
F18: P1.3 U1.F18
GPIO0_3: R21.1 U1.E25
GPIO0_4: R19.1 U1.G24
GPIO0_5: R18.1 U1.F25
GPIO0_6: R17.1 U1.F24
GPIO1_50: D5.2(\C\) U1.C20
I2C0_SCL: R27.2 U1.B16 U11.1
I2C0_SDA: R25.2 U1.A16 U11.24
J23: U1.J23 U13.C2
J25: U1.J25 U13.D2
MCU_ERRORN: TP2.1(\TP\) U1.D1
MCU_GPIO0_1: U1.B8 U11.14
MCU_PORZ: R65.1 U1.D2 U4.4(\Y\)
MCU_RESETSTATZ: TP3.1(\TP\) U1.B12
MCU_RESETZ: R23.2 TP4.1(\TP\) U1.E11
MCU_SPI0_CLK: U1.A7 U11.10
MCU_SPI0_CS0: U1.E8 U11.6
MCU_SPI0_D0: U1.D9 U11.8
MCU_SPI0_D1: TP6.1(\TP\) U1.C9 U11.15
N20: P1.13 U1.N20
NRESET: P2.26 R159.2 U4.2 U17.18
PMIC_LPM_EN0: R228.2 U1.B7 U17.31
PORZ_OUT: D47.2(\C\) R63.1 U1.E21
PWR_BTN: P2.12 R161.2 SW2.2 SW2.4(\B2\) U17.25
RESET_REQZ: R24.2 TP5.1(\TP\) U1.F20
RESETSTATZ: D4.2(\C\) D17.2(\C\) D48.2(\C\) R60.1 U1.F22 U17.28
SD_CD: D2.2 J3.G1 R61.2 U1.D17
SD_CLK: D22.2 J3.T5 R64.2 R70.1 R90.2
SD_CMD: D21.2 J3.T3 R89.2 U1.A21
SD_D0: D23.2 J3.T7 R92.2 U1.A22
SD_D1: D26.2 J3.T8 R95.2 U1.B21
SD_D2: D19.2 J3.T1 R79.2 U1.C21
SD_D3: D20.2 J3.T2 R30.2 U1.D22
SD_PWR_EN: D16.2(\C\) U1.H24
SD_VOLT_SEL: R54.2 U1.C17 U17.12
SOC_EMU0: J1.7 R35.2 U1.E12
SOC_EMU1: J1.10 R34.2 U1.C11
SOC_TCK: J1.4 R31.2 U1.A10
SOC_TDI: J1.8 R33.2 U1.A11
SOC_TDO: J1.6 U1.D12
SOC_TMS: J1.2 R32.2 U1.B11
SOC_TRST#: J1.9 R36.1 U1.B10
U22: P2.2 U1.U22
USB0_DM: L13.1 U1.AE11
USB0_DP: L13.4 U1.AD11
USB1_DM: P1.9 U1.AD10
USB1_DP: P1.11 U1.AE9
USB1_VBUS: R67.1 R69.1 U1.AB10
USB_5V: C6.1 C10.1 C44.1 C130.1 J14.B4 J14.B9 P1.7 R37.1 R132.2 U5.6 U6.4 U6.5 U6.6 U9.5
USB_C_DM: D25.2 J14.A7 J14.B7 L13.2
USB_C_DP: D24.2 J14.A6 J14.B6 L13.3
USER_BTN: Q1.1 Q2.1 R28.2 R29.1 SW1.2 SW1.4(\B2\)
VSYS: C15.1 C53.1 C62.1 C63.1 C64.1 C133.1 P1.24(\VOUT\) P2.13(\VOUT\) R137.1 R139.1 R161.1 U7.6 U9.6 U10.6 U12.6(\VIN\) U17.4 U17.5 U17.13(\VSYS\) U17.26 U17.30
W24: P2.8 U1.W24
W25: P2.6 U1.W25
WKUP_I2C0_SCL: R51.2 U1.B9 U17.10
WKUP_I2C0_SDA: R59.2 U1.A9 U17.9
Y20: P1.29 U1.Y20
Y22: P1.31 U1.Y22
Y23: P2.24 U1.Y23
Y24: P1.20 U1.Y24
Y25: P2.20 U1.Y25
N8480473: C76.1 U3.C2
N8502406: D47.1 D48.1 D56.1 R14.2 U3.K5
N15874060: R1.1 U2.F9(\ZQ\)
N15874116: TP11.1(\TP\) U2.T7
N15878591: C82.1 R2.2 R3.2
N15909544: R88.2 U1.M2
N15997187: L14.1 U17.2 U17.3
N15997584: C52.1 U17.14
N15997644: L17.1 U17.27
N15998811: L16.1 U17.29
N16025692: R131.1 U1.AE10
N16025696: R130.1 U1.AC9
N16034849: L18.1 U12.5
N16034871: C11.1 R260.1 R261.1 U12.3
N16038113: C136.1 U1.G9
N16038120: C137.1 U1.H11
N16038127: C138.1 U1.J19
N16038134: C139.1 U1.H17
N16038141: C140.1 U1.U7
N16038148: C141.1 U1.P19
N16038155: C142.1 U1.W17
N16038162: C143.1 U1.K18
N16038169: C144.1 U1.H15
N16043280: C22.1 J2.1 R26.1 U1.J8
N16177059: R15.1 TP1.1(\TP\) U3.H5
N16646883: R94.2 R132.1 U1.AC11
N17713632: LED1.1 R17.2
N17713634: LED2.1 R18.2
N17713636: LED3.1 R19.2
N17713638: LED4.1 R21.2
N17713640: LED5.1 R22.2
N17714626: C2.1 R66.1 U1.C2 X1.1
N17714640: C1.1 U1.C1 X1.2
N17714779: C3.1 U1.B2 X2.3
N17714825: C4.1 U1.A3 X2.1
N17744709: R46.1 U5.4
N17749261: LED6.1 R38.2
N17752861: P1.18 R48.1
N17806286: D1.2(\C\) R29.2
N17809536: R52.1 U1.AA14
N17822897: R64.1 U1.B22
N17823731: D16.1 D17.1 R96.2 U8.3
N17852744: R55.2 R56.1 U7.1 U7.4
N17852767: R56.2 R57.1 U7.2
N17852826: C12.1 U7.7
N17855551: R37.2 R39.1 U9.1 U9.4
N17855593: R39.2 R40.1 U9.2
N17855603: C13.1 U9.7
N17856818: R41.2 R42.1 U10.1 U10.4
N17856864: R42.2 R43.1 U10.2
N17856874: C14.1 U10.7
N17856912: R43.2 R53.1 R62.1
N17858761: R62.2 U7.3(\PG\) U9.3(\PG\)
N17861361: R44.2 U11.5
N17861988: C16.1 D4.1 D5.1 R45.2 U11.2
N17863050: C19.1 U11.23
N17864579: TP7.1(\TP\) U11.19
N17866231: Q1.2(\S\) R58.2
N17951154: D3.2(\CATHODE\) R67.2 R68.1
N17970480: D6.2(\C\) R72.1
N178666392: Q2.2(\S\) R50.2

Pads without a net: J14 A8 B8; U1 A2 A4 A6 A8 A12 A23 AA5 AA7 AA8 AA12 AA15 AB4 AB6 AB12 AB14 AB16 AB17 AC5 AC6 AC13 AC15 AC17 AD3 AD4 AD5 AD6 AD7 AD8 AD13 AD14 AD15 AD17 AD19 AD20 AE2 AE3 AE4 AE5 AE6 AE7 AE13 AE14 AE15 AE17 AE19 AE20 B1 B4 B6 B23 B24 C5 C6 C24 C25 D10 D24 D25 E7 E23 E24 F6 G21 G25 H21 H25 J3 J4 J22 J24 K2 K25 L21 L23 L24 L25 M21 M24 N2 P25 T2 U4 U23 V25 Y6 Y8 Y15; U3 A1 A2 A7 A8 A9 A10 A11 A12 A13 A14 B1 B7 B8 B9 B10 B11 B12 B13 B14 C1 C3 C5 C7 C8 C9 C10 C11 C12 C13 C14 D1 D2 D3 D4 D12 D13 D14 E1 E2 E3 E5 E8 E9 E10 E12 E13 E14 F1 F2 F3 F10 F12 F13 F14 G1 G2 G3 G10 G12 G13 G14 H1 H2 H3 H12 H13 H14 J1 J2 J3 J12 J13 J14 K1 K2 K3 K6 K7 K10 K12 K13 K14 L1 L2 L3 L12 L13 L14 M1 M2 M3 M7 M8 M9 M10 M11 M12 M13 M14 N1 N3 N6 N7 N8 N9 N10 N11 N12 N13 N14 P1 P2 P7 P8 P9 P10 P11 P12 P13 P14; U4 1; U7 10; U8 4; U9 10; U10 3 10; U11 7 9 13; U12 2; U17 8 16

## Via types
v1: diameter 0.406, hole 0.203, TOP to BOTTOM, 840 vias
v2: diameter 0.406, hole 0.203, LYR2_GND to LYR9_GND, 91 vias
v3: diameter 0.254, hole 0.102, LYR9_GND to BOTTOM, 176 vias
v4: diameter 0.254, hole 0.102, TOP to LYR2_GND, 39 vias

## Routing (per net, layer and track width the routed paths; a pad name or vN(x,y) marks a point on that pad's centre or on a via; arc(x,y) is an arc through that point)
GND: length 472.1
  TOP w0.102: 26.56,14.39 C185.2 ; 27.99,18.32 C159.2 28.02,18.16 27.99,18.13 ; 25.7,14.29 C212.2 ; 30.51,17.42 30.53,17.4 C218.2 ; v1(35.39,19.76) 35.3,19.67 35.3,19.57 ; C139.2 30.94,13.77 ; C210.2 28.12,13.85 ; C149.2 28.8,19.21 ; C219.2 30.05,14.44 ; C119.2 7.35,16.11 ; C189.2 27.42,15.7 ; C154.2 30.7,12.84 30.72,12.86 ; C190.2 29.4,19.71 29.37,19.73 ; v1(31.16,13.81) 31.17,13.82 C138.2 ; 12.93,11.08 12.96,11.11 C123.2 ; C272.2 28.02,12.16 28,12.13 ; C216.2 26.21,13.79 ; 31.68,17.58 31.65,17.6 C141.2 ; C144.2 29.29,13.71 29.31,13.73 ; 25.17,18.03 C226.2 ; C59.2 5.72,9.88 ; 24.93,15.5 24.95,15.52 C228.2 ; C184.2 29.93,16.36 ; C136.2 25.56,12.74 ; 28.19,20.89 C171.2 ; 29.36,18.05 29.33,18.07 C191.2 ; C146.2 24.86,12.75 ; C223.2 30.68,20.77 ; 30.56,16.28 C213.2 ; C174.2 25.71,21.78 ; C197.2 26.11,17.21 ; C167.2 26.18,19.32 ; C143.2 30.61,15.09 30.63,15.07 ; C115.2 5.7,15.9 ; C180.2 27.88,14.44 ; C100.2 5.72,15.27 ; C194.2 25.04,14.55 ; 27.07,12.53 C221.2 ; C182.2 24.95,16.8 ; C165.2 26.19,16.42 ; C273.2 23.88,17.76 ; C205.2 24.01,14.88 ; C168.2 25.54,19.33 ; J3.S4 45.65,19.91 ; 27.51,13.77 C137.2
  TOP w0.152: v1(31.16,13.81) 31.16,13.3 30.72,12.86 30.72,12.78
  TOP w0.203: 30.56,16.28 30.48,16.36 29.93,16.36 29.93,15.95 29.68,15.7 ; 25.7,14.29 26.06,14.29 26.06,14.29 26.46,14.29 ; 25.7,14.29 25.7,13.94 25.85,13.79 26.21,13.79 26.21,14.04 26.46,14.29 ; 25.7,14.29 25.31,14.29 25.04,14.55 25.04,14.64 24.66,15.02 24.66,15.23 ; 27.51,13.77 27.59,13.85 28.12,13.85 28.12,14.2 27.88,14.44 ; 24.94,18.67 24.94,19 v1(24.66,19.29) 24.61,19.33 24.49,19.33 ; 24.94,18.67 24.94,18.26 25.17,18.03 25.17,18.31 25.53,18.67 ; 24.94,18.67 25.53,18.67 ; 31.75,15.78 31.48,15.51 31.46,15.51 31.25,15.31 v1(31.07,15.31) 30.85,15.09 30.63,15.09 30.63,15.07 30.36,14.8 30.35,14.8 30.05,14.51 30.05,14.44 ; 28.96,14.33 28.54,14.74 28.24,14.44 ; 28.96,14.33 29.19,14.33 ; 28.96,14.33 28.35,14.33 28.24,14.44 28.24,14.44 ; 26.92,20.95 26.92,21.01 v1(26.71,21.23) ; 27.29,17.02 27.29,16.43 27.37,16.36 27.37,16.01 v1(27.61,15.77) ; 27.29,17.02 27.29,17.19 v1(27.21,17.27) ; 27.29,17.02 27.53,16.78 29.09,16.78 v1(29.11,16.81) 29.25,16.94 29.25,17.42 ; v1(27.14,19.23) 27.57,19.65 28.54,19.65 28.77,19.89 ; v1(27.14,19.23) 27.09,19.17 26.32,19.17 26.18,19.32 25.55,19.32 25.54,19.33 25.54,18.68 25.53,18.67 ; v1(27.14,19.23) 27.27,19.1 27.27,18.49 ; 28.24,14.44 27.88,14.44 ; 26.19,16.42 26.19,16.75 v1(26.17,16.77) 26.11,16.83 26.11,17.21 ; 30.53,17.42 30.51,17.42 30.24,17.69 30.24,17.71 30.23,17.71 30.23,17.74 30.12,17.86 30.12,18.14 ; 26.46,14.29 26.56,14.39 27.17,14.39 27.22,14.44 ; v1(20.62,20.71) 20.89,20.44 20.98,20.35 20.98,20.32 22.16,19.14 22.16,18.97 22.41,18.72 22.83,18.72 23.79,17.76 23.88,17.76 ; 29.31,13.71 29.31,13.73 ; 29.31,13.73 29.31,14.21 29.19,14.33 ; 29.31,13.73 29.58,14 29.62,14 29.77,14.15 29.78,14.15 30.05,14.42 30.05,14.44 ; 30.05,14.44 29.66,14.44 29.55,14.33 29.19,14.33 ; 31.31,27.59 v1(30.3,28.6) v1(29.85,28.6) ; v1(24.67,15.84) 24.93,15.57 24.93,15.52 ; 27.88,14.44 27.44,14.44 v1(27.29,14.29) ; v1(31.14,18.23) 31.15,18.23 31.64,17.73 31.68,17.73 ; 28.14,12.13 27.72,12.13 27.64,12.21 27.64,12.24 27.62,12.27 v1(27.62,12.34) 27.62,12.34 27.54,12.34 27.49,12.39 27.46,12.39 27.32,12.53 27.07,12.53 ; 24.95,16.8 24.95,16.16 ; 31.17,13.79 30.96,13.79 30.94,13.77 ; 27.67,15.82 27.54,15.82 27.42,15.7 ; 29.68,20.79 30.02,20.79 30.02,20.79 ; 29.68,20.79 29.69,20.81 ; 29.68,20.79 v1(29.65,20.79)
  TOP w0.229: 13.85,13.8 C120.2 14.48,13.8 ; 16.76,25.02 C231.2 ; C231.2 17.17,24.61 ; C231.2 17.17,25.42 ; C231.2 17.57,25.02 ; C76.2 16.65,23.82 ; C76.2 16.03,23.82 ; C76.2 16.34,23.53 ; 6.42,19.54 C102.2 6.73,19.24 ; J14.S1 54.55,21.82 ; J14.S1 53.3,22.58 ; J14.S1 53.3,21.07 ; 12.37,9.65 C117.2 12.37,9.03 ; C80.2 3.79,9.78 ; C80.2 3.79,8.98 ; C80.2 4.19,9.38 ; 47.16,13.39 J3.T6 45.86,13.39 ; 29.5,14.35 C201.2 28.88,14.35 ; P2.21 24.35,27.28 ; P2.21 23.69,28.39 ; P2.21 23.69,26.18 ; 28.35,15.84 C162.2 27.72,15.84 ; 27.76,17.67 C176.2 28.38,17.67 ; 27.29,17.99 C195.2 27.29,17.37 ; 29.04,16.76 C199.2 28.42,16.76 ; 10.88,21.01 C114.2 11.5,21.01 ; 25.57,18.37 C156.2 25.27,18.68 ; 50.35,21.82 J14.S2 49.1,21.07 ; C73.2 15.99,23.82 ; C73.2 15.37,23.82 ; C73.2 15.68,23.52 ; 30.33,20.76 C142.2 29.71,20.76 ; 5.72,18.38 R1.2 5.41,18.08 ; 13.85,19.92 C58.2 14.48,19.92 ; 26,22.81 R69.2 ; R69.2 26.62,22.81 ; R69.2 26.31,23.1 ; 29.22,17.74 C200.2 29.22,17.11 ; 36.65,18.04 R172.2 ; R172.2 36.94,18.35 ; R172.2 36.94,17.73 ; 27.27,16.71 C196.2 27.27,17.33 ; C67.2 15.29,23.82 ; C67.2 14.98,23.53 ; C67.2 14.67,23.82 ; 24.92,18.36 C140.2 24.92,18.98 ; 17.11,23.27 C225.2 ; C225.2 17.4,22.95 ; C225.2 17.4,23.58 ; R15.2 13.87,23.8 ; R15.2 13.25,23.8 ; R15.2 13.56,23.51 ; 27.24,18.18 C192.2 27.24,18.8 ; 48.1,23.32 R46.2 ; R46.2 48.4,23 ; R46.2 48.4,23.63 ; 37.39,23.17 C21.2 37.08,23.46 ; 38.37,19.9 D19.1 38.37,19.09 ; 52.05,13.22 J14.S3 ; J14.S3 53.3,13.98 ; J14.S3 53.3,12.47 ; J14.S3 54.55,13.22 ; 28.19,14.46 C180.2 27.57,14.46 ; 24.88,22.89 R130.2 24.47,23.29 ; 24.97,16.47 C227.2 24.97,15.85 ; 3.12,11.63 C5.2 2.83,11.32 ; 29.8,18.16 C217.2 30.43,18.16 ; 27.3,19.63 C198.2 27.92,19.63 ; 39.69,18.55 D20.1 39.29,18.96 ; 0.52,20.56 J4.5 ; J4.5 1.57,21.31 ; J4.5 1.57,19.81 ; J4.5 2.62,20.56 ; 7.29,18.65 C81.2 7,18.96 ; 0.52,25.16 J4.4 ; J4.4 1.57,24.41 ; J4.4 1.57,25.91 ; J4.4 2.62,25.16 ; 17.17,23.67 C224.2 ; C224.2 17.17,24.48 ; C224.2 16.76,24.08 ; C224.2 17.57,24.08 ; 26.53,19.2 C152.2 ; C152.2 27.15,19.2 ; C152.2 26.84,18.91 ; 29.56,17.52 C186.2 30.18,17.52 ; 47.85,13.22 J14.S4 ; J14.S4 50.35,13.22 ; J14.S4 49.1,13.98 ; 13.63,13.52 13.74,13.52 ; 5.44,22.41 J4.2 ; J4.2 4.52,22.86 ; J4.2 5.44,23.31 ; 40.45,8.79 J3.S2 39.7,9.46 ; 26.61,20.93 C208.2 27.24,20.93 ; D26.1 39.26,10.33 ; D26.1 39.26,9.52 ; D26.1 39.66,9.92 ; 44.9,10.14 J3.S1 45.65,9.46 ; 29.35,22.29 D3.1 29.89,22.79 ; 49.1,21.83 49.1,22.58 ; 14.48,15.73 C116.2 13.85,15.73 ; 33.5,20.47 U4.3 34.16,20.94 ; 25.38,20.9 C181.2 24.76,20.9 ; 32.01,15.8 C211.2 31.72,16.11 ; 14.31,23.52 C68.2 ; C68.2 14.62,23.81 ; C68.2 14,23.81 ; R60.2 32.72,13.09 ; R60.2 32.72,12.46 ; R60.2 33.01,12.78 ; 27.34,16.67 C187.2 27.34,16.05 ; 25.29,25.01 R52.2 24.89,25.41 ; 44.9,20.59 J3.S4 44.15,19.91 ; 51.81,27.17 51.81,27.26
  TOP w0.254: v1(32.01,27.81) 31.53,27.81 31.31,27.59 P2.15 ; C214.2 24.19,24.99 v1(24.42,24.76) 24.51,24.76 24.75,25.01 R52.2 ; v1(12.8,20.56) 13.47,19.89 14.17,19.89 ; 12.34,9.34 12.34,8.9 v1(12.71,8.53) ; 29.36,18.05 29.51,18.19 30.06,18.19 30.12,18.14 ; 29.36,18.05 29.23,18.05 29.23,17.9 v1(29.11,17.79) 29.25,17.65 29.25,17.42 29.37,17.55 29.87,17.55 ; 29.36,18.05 29.41,18.05 v1(29.67,17.79) ; C99.2 13.63,13.52 v1(13.67,13.56) 13.89,13.78 14.17,13.78 ; 30.12,18.14 30.24,18.26 31.11,18.26 v1(31.14,18.23) ; 30.12,18.14 30.02,18.14 v1(29.67,17.79) ; 23.88,19.23 23.99,19.33 24.49,19.33 ; 34.64,19.58 35.29,19.58 35.3,19.57 ; 14.17,15.71 14.14,15.71 v1(13.72,15.29) ; v1(28.68,19.77) 28.8,19.64 28.8,19.21 ; 5.7,15.9 5.7,15.28 5.72,15.27 6.17,15.27 v1(6.21,15.31) ; 24.93,15.52 24.93,15.5 24.44,15 24.13,15 23.99,14.87 ; v1(27.21,17.27) 27.32,17.37 27.32,17.68 ; 31.68,17.38 31.68,17.73 ; 27.32,17.68 27.32,18.15 v1(27.2,18.27) 27.25,18.32 27.99,18.32 27.99,17.77 28.07,17.7 28.05,17.68 27.32,17.68 ; 36.76,20.45 36.93,20.62 R65.2 37.2,20.62 v1(37.22,20.6) ; R1.2 6.33,18.08 v1(6.36,18.06) ; 5.72,9.88 5.44,9.88 v1(5.29,9.73) ; v1(24.67,12.21) 24.86,12.39 24.86,12.75 24.86,12.74 25.56,12.74 ; 30.94,13.77 31.12,13.77 v1(31.16,13.81) 31.17,13.79 31.56,13.79 ; 11.19,21.04 11.93,21.04 12.49,21.04 v1(12.85,21.4) ; v1(24.66,16.83) 24.69,16.8 24.95,16.8 ; 25.07,20.92 25.07,21.1 v1(25.22,21.25) ; R195.2 v4(36.98,17.04) R193.2 ; 30.53,17.42 30.4,17.55 29.87,17.55 ; v1(29.67,17.79) 29.87,17.59 29.87,17.55 ; 31.75,15.78 31.75,16.22 ; v1(49.26,26.72) 49.35,26.72 49.39,26.76 ; v1(48.83,26.72) 48.87,26.76 ; 38.47,19.49 38.62,19.34 ; 38.47,19.49 D19.1 38.35,19.49 v1(38.34,19.48) ; 38.47,19.49 38.32,19.34 ; v1(1.96,13.84) 2.09,13.71 R36.2 ; 30.02,20.79 30.04,20.77 30.68,20.77 30.68,20.88 30.94,21.13 31,21.13 ; 29.83,19.48 29.58,19.73 28.93,19.73 28.63,20.02 28.63,20.74 28.49,20.89 28.19,20.89 ; 27.42,15.7 27.54,15.7 v1(27.61,15.77) 27.67,15.82 28.03,15.82 ; v1(7.1,15.67) 7.35,15.92 7.35,16.11 ; P1.22 23.69,8.4 23.43,8.66 v1(23.43,8.94) ; 24.95,16.16 24.95,16.11 v1(24.67,15.84) ; v1(25.28,23.11) 25.71,22.68 25.71,21.78 ; 25.15,19.15 25.33,19.33 25.54,19.33 ; 12.97,11.08 12.93,11.08 v1(12.81,10.96) ; 27.61,19.65 27.61,20.01 ; v1(38.3,16.7) D21.1 38.48,16.7
  TOP w0.305: v1(51.85,27.2) 51.81,27.17 R47.2
  TOP w0.381: R129.2 47.94,22.53 v1(48.17,22.76) 49.1,21.83 J14.S2 ; P1.16 31.31,6.37 v1(31.53,6.15) ; v1(24.67,23.62) 24.88,23.42 R130.2 25.1,23.29 v1(25.28,23.11) ; J3.S2 40.49,9.46 41.28,10.26 ; v1(3.26,9.7) 3.47,9.7 C80.2
  TOP w0.508: v1(48.17,22.76) 48.19,22.78
  LYR2_GND w0.351: 47.85,21.82 J14.S2 ; J14.S2 50.35,21.82 ; J14.S2 49.1,21.07 ; J14.S2 49.1,22.58 ; J14.S1 53.3,22.58 ; J14.S1 53.3,21.07 ; J14.S1 54.55,21.82 ; J14.S1 52.05,21.82 ; J14.S4 50.35,13.22 ; J14.S4 47.85,13.22 ; J14.S4 49.1,13.98 ; 52.05,13.22 J14.S3 ; J14.S3 54.55,13.22 ; J14.S3 53.3,13.98 ; J14.S3 53.3,12.47
  LYR3 w0.351: 53.3,21.07 J14.S1 ; J14.S1 54.55,21.82 ; J14.S1 53.3,22.58 ; J14.S3 54.55,13.22 ; J14.S3 53.3,13.98 ; J14.S3 53.3,12.47 ; 49.1,21.07 J14.S2 49.1,22.58
  LAY4_G w0.381: 49.1,21.07 J14.S2 ; J14.S2 49.1,22.58 ; J14.S2 50.35,21.82 ; J14.S2 47.85,21.82 ; 53.3,21.07 J14.S1 ; J14.S1 54.55,21.82 ; J14.S1 53.3,22.58 ; J14.S1 52.05,21.82 ; 52.05,13.22 J14.S3 ; J14.S3 54.55,13.22 ; J14.S3 53.3,12.47 ; J14.S3 53.3,13.98 ; 47.85,13.22 J14.S4 ; J14.S4 50.35,13.22 ; J14.S4 49.1,13.98
  LAY6_PWR2 w0.381: J14.S3 54.55,13.22 ; J14.S3 53.3,12.47 ; J14.S3 53.3,13.98 ; 53.3,21.07 J14.S1 ; J14.S1 54.55,21.82 ; J14.S1 53.3,22.58
  LAY8 w0.351: 53.3,21.07 J14.S1 ; J14.S1 53.3,22.58 ; J14.S1 54.55,21.82 ; J14.S1 52.05,21.82 ; J14.S2 50.35,21.82 ; J14.S2 49.1,22.58 ; J14.S2 47.85,21.82 ; J14.S2 49.1,21.07
  LYR9_GND w0.351: 53.3,21.07 J14.S1 ; J14.S1 54.55,21.82 ; J14.S1 53.3,22.58 ; J14.S1 52.05,21.82 ; J14.S4 50.35,13.22 ; J14.S4 49.1,13.98 ; J14.S4 47.85,13.22 ; 49.1,21.07 J14.S2 ; J14.S2 49.1,22.58 ; J14.S2 47.85,21.82 ; J14.S2 50.35,21.82 ; 53.3,12.47 J14.S3 ; J14.S3 52.05,13.22 ; J14.S3 54.55,13.22 ; J14.S3 53.3,13.98
  BOTTOM w0.081: U1.Y2 21.91,20.52 20.79,20.52 20.71,20.6 20.71,20.62 v1(20.62,20.71)
  BOTTOM w0.102: 3.95,7.9 3.95,7.87 ; U1.G19 30.62,13.77 30.16,14.23 U1.H18
  BOTTOM w0.152: 49.77,7.01 v1(49.77,7.88) ; v1(49.77,7.88) 49.77,8.74 ; v1(49.77,7.88) 49.21,7.88 ; v1(49.77,7.88) 50.33,7.88 ; v3(20.29,8.1) 19.88,8.1 v3(20.29,8.1) ; v3(20.29,8.1) 20.29,7.69 v3(20.29,8.1) ; v3(20.29,8.1) 20.69,8.1 v3(20.29,8.1) ; v3(20.29,8.1) 20.29,8.5 v3(20.29,8.1) ; D7.1 5.01,25.37 ; D7.1 5.01,24.56 ; D7.1 5.41,24.97 ; D7.1 4.6,24.97 ; R40.2 32.32,32.93 ; R40.2 31.92,33.34 ; R40.2 31.51,32.93 ; R40.2 31.92,32.53 ; 5.39,22.7 C22.2 ; C22.2 5.68,23.01 ; C22.2 5.39,23.32 ; U2.C9 7.08,19.3 ; U2.C9 6.75,19.63 ; U2.C9 6.42,19.3 ; 6.75,15.63 U2.H9 6.75,14.97 ; U2.A8 7.55,21.23 ; U2.A8 7.88,20.9 ; U2.A8 7.22,20.9 ; 4.3,10.43 R83.2 3.99,10.13 ; 6.75,18.03 U2.E9 7.08,17.7 ; 53.05,14.87 v1(53.05,16.02) ; v1(53.05,16.02) 51.9,16.02 ; v1(53.05,16.02) 53.05,17.18 ; v1(53.05,16.02) 54.2,16.02 ; U17.33 45.48,22.98 ; U17.33 41.73,22.98 ; U17.33 43.6,21.1 ; U17.33 43.6,24.86 ; 13.15,15.63 U2.H1 13.15,14.97 ; 12.82,8.9 U2.T1 ; U2.T1 13.48,8.9 ; U2.T1 13.15,8.57 ; 6.75,11.77 U2.M9 7.08,12.1 ; R44.1 15.45,2.07 ; R44.1 15.05,1.66 ; R44.1 15.05,2.47 ; R44.1 14.64,2.07 ; 49.1,22.58 J14.S2 49.1,21.07 ; 17.89,14.52 R85.2 17.49,14.92 ; 45.97,12.47 U6.3 ; U6.3 46.27,12.92 ; U6.3 45.66,12.92 ; v1(30.7,19.23) 30.7,19.23 ; 53.54,10.87 LED2.2 53.07,11.28 ; 7.55,18.17 U2.D8 ; U2.D8 7.55,18.83 ; U2.D8 7.88,18.5 ; 14.21,3.25 v3(13.9,3.25) 13.9,2.96 ; D8.1 6.91,23.98 ; D8.1 6.51,23.58 ; D8.1 6.51,24.38 ; U2.N1 13.48,11.3 ; U2.N1 13.15,10.97 ; U2.N1 12.82,11.3 ; D24.1 47.51,19.02 ; D24.1 47.11,18.62 ; D24.1 47.11,19.43 ; 23.51,27.51 R20.2 23.2,27.8 ; LED4.2 53.54,9.04 ; LED4.2 53.07,9.45 ; LED4.2 52.6,9.04 ; 3.98,25.88 U13.D1 3.71,25.61 ; C3.2 21.61,8.1 ; C3.2 21.21,7.69 ; C3.2 21.21,8.5 ; U11.25 12.18,3.5 ; U11.25 10.78,4.91 ; U11.25 9.38,3.5 ; R53.2 30.02,34.27 ; R53.2 30.02,33.47 ; R53.2 30.43,33.87 ; 17.1,8.1 C1.2 ; C1.2 17.51,8.5 ; C1.2 17.51,7.69 ; 18.04,17.63 R88.1 18.04,17.01 ; X2.2 23.39,5.12 ; X2.2 22.58,4.43 ; X2.2 23.39,3.75 ; X2.2 24.2,4.43 ; J14.S1 53.3,22.58 ; J14.S1 54.55,21.82 ; J14.S1 53.3,21.07 ; U6.1 47.57,12.92 ; U6.1 47.27,12.47 ; U6.1 46.96,12.92 ; 38.29,13.89 R71.2 37.98,13.6 ; 50.81,29.45 LED5.2 ; LED5.2 50.4,29.92 ; LED5.2 50.81,30.39 ; LED5.2 51.22,29.92 ; C14.2 27.14,28.9 ; C14.2 27.14,28.27 ; C14.2 26.85,28.59 ; 1.74,15.86 J1.5 ; J1.5 2.33,16.46 ; J1.5 1.14,16.46 ; 3.72,28.67 C8.2 3.72,28.05 ; C19.2 11.27,7.01 ; C19.2 10.96,7.3 ; C19.2 10.64,7.01 ; 16.65,7.37 R87.2 16.94,7.06 ; 53.54,9.96 v1(53.07,9.96) 53.07,9.55 ; 53.3,12.47 J14.S3 ; J14.S3 53.3,13.98 ; J14.S3 54.55,13.22 ; 12.35,18.83 U2.D2 12.02,18.5 ; R57.2 36.33,33.34 ; R57.2 36.33,32.53 ; R57.2 36.74,32.93 ; C122.2 16.94,7.71 ; C122.2 16.65,8.02 ; C122.2 16.65,7.4 ; v1(53.05,19.02) 54.2,19.02 ; v1(53.05,19.02) 53.05,17.87 ; v1(53.05,19.02) 51.9,19.02 ; v1(53.05,19.02) 53.05,20.18 ; 14.31,3.04 v3(14.72,3.04) ; v3(14.72,3.04) 15.12,3.04 ; v3(14.72,3.04) 14.72,2.64 ; v3(14.72,3.04) 14.72,3.44 ; C124.2 16.94,8.37 ; C124.2 16.65,8.06 ; C124.2 16.65,8.68 ; 53.07,11.38 v1(53.07,11.78) ; v1(53.07,11.78) 53.54,11.78 ; v1(53.07,11.78) 53.07,12.19 ; 3.99,7.6 C101.2 4.3,7.9 ; 32.84,28.59 v3(33.14,28.59) 33.14,28.9 ; U2.E8 7.88,17.7 ; U2.E8 7.22,17.7 ; U2.E8 7.55,18.03 ; 46.31,12.92 U6.2 ; U6.2 46.92,12.92 ; U6.2 46.62,12.47 ; 30.15,18.27 v1(29.67,17.79) ; 23.58,32.33 R63.2 ; R63.2 23.58,32.95 ; R63.2 23.29,32.64 ; 44.79,7.88 SW1.3 ; SW1.3 45.91,7.88 ; SW1.3 45.35,7.01 ; 49.77,10.61 SW2.1 ; SW2.1 49.77,12.34 ; SW2.1 50.33,11.48 ; 13.15,14.03 U2.K1 13.15,13.37 ; 24.88,6.28 X2.4 ; X2.4 25.69,6.97 ; X2.4 25.69,5.6 ; SW1.1 45.35,12.34 ; SW1.1 45.91,11.48 ; SW1.1 44.79,11.48 ; 11.55,17.37 U2.E3 ; U2.E3 11.55,18.03 ; U2.E3 11.22,17.7 ; U2.E3 11.88,17.7 ; U2.K9 6.75,14.03 ; U2.K9 6.75,13.37 ; U2.K9 6.42,13.7 ; 1.14,13.92 J1.3 ; J1.3 1.74,14.52 ; J1.3 1.74,13.32 ; J1.3 2.33,13.92 ; 13.15,16.57 U2.F1 13.48,16.9 ; U1.H16 29.07,14.27 28.6,14.73 v1(28.58,14.71) ; 7.88,16.1 U2.G8 7.55,16.43 ; v1(37.22,20.6) 37.22,20.62 37.68,21.08 R91.2 ; 23.15,9.4 C4.2 23.55,9 ; v1(27.29,14.29) 27.27,14.27 ; 5.39,23.37 R26.2 ; R26.2 5.68,23.68 ; R26.2 5.39,24 ; 37.64,28.59 v3(37.94,28.59) 37.94,28.27 ; 49.1,13.72 49.1,13.98
  BOTTOM w0.203: U1.H13 U1.G13 ; U1.H13 U1.J13 ; U1.H13 28.02,14.27 ; U1.H13 27.27,14.27 27.27,14.15 U1.G13 ; U1.G13 U1.F13 ; R170.2 37.17,20.55 v1(37.22,20.6) ; U17.15 42.35,20.27 42.15,20.06 42.09,20.06 42.07,20.05 41.64,20.05 ; U1.R13 U1.T13 ; U1.R13 U1.P13 v1(27.21,17.27) 27.21,17.32 U1.R13 ; U1.R13 U1.T14 ; U1.T13 U1.T14 ; U1.T13 v1(27.2,18.27) ; U10.9 26.78,29.11 ; U1.T17 29.66,17.8 v1(29.67,17.79) 29.69,17.77 U1.R18 U1.T18 U1.T17 ; U1.T17 U1.T16 ; U1.J13 27.29,14.4 v1(27.29,14.29) ; U1.J13 U1.K13 27.66,15.72 27.61,15.77 v1(27.61,15.77) ; U1.V13 27.65,19.26 27.18,19.26 v1(27.14,19.23) 27.08,19.29 26.68,19.29 U1.V11 U1.V10 ; U7.8 v3(37.72,29.18) ; U13.A1 3.71,28.35 C8.2 4.16,28.36 v1(4.28,28.47) ; v1(43.67,16.31) 43.9,16.53 43.77,16.53 43.52,16.79 ; U1.T14 U1.R15 ; C133.2 39.72,6.23 39.72,5.61 39.89,5.44 U12.4 39.89,4.7 39.68,4.49 v1(39.51,4.49) ; U1.V18 30.66,19.27 v1(30.7,19.23) ; v1(27.61,15.77) 27.61,15.81 U1.M12 U1.M13 27.66,15.81 v1(27.61,15.77) ; U1.H20 v1(31.16,13.81) 31.12,13.77 U1.G19 ; U9.8 v3(33.2,29.15) ; U9.9 v3(32.75,29.11) ; U11.25 10.78,3.48 ; U11.25 v1(11.69,4.42) 12.12,4.85 ; U11.25 11.03,3.25 U11.4 13.7,3.25 ; 10.78,3.48 10.78,3.45 9.48,2.16 ; 10.78,3.48 12.1,2.16 ; v1(17.35,27.89) 17.31,27.89 17.11,27.69 U3.A6 ; U1.K15 28.61,15.22 28.61,14.76 28.58,14.73 v1(28.58,14.71) ; U10.8 v3(27.23,29.11) ; U1.V16 28.68,19.75 v1(28.68,19.77) ; U1.L20 31.16,15.44 31.07,15.35 v1(31.07,15.31) 31.03,15.31 30.99,15.27 U1.K19 ; U1.AA11 26.66,21.17 v1(26.71,21.23) ; v1(24.66,16.83) U1.P7 ; U1.M18 U1.M17 29.61,16.27 29.11,16.77 v1(29.11,16.81) ; U1.AD12 U1.AE12 v1(27.16,23.2) ; v1(24.66,19.29) U1.W7 24.66,20.23 ; 13.7,3.25 13.9,3.25 v3(13.9,3.25) 13.7,3.25 13.7,3.25 ; v1(25.22,21.25) 25.24,21.25 25.25,21.27 U1.AB9 ; v1(31.14,18.23) 31.16,18.21 U1.R20 ; U1.T8 U1.U8 v1(25.61,18.77) 25.61,18.78 25.66,18.82 U1.V9 ; U1.AE8 U1.AD9 ; U7.9 v3(37.27,29.13) ; v1(24.67,15.84) 24.66,15.85 U1.M7 U1.M8 24.72,15.84 v1(24.67,15.84)
  BOTTOM w0.254: R49.2 37.37,15.14 37.4,15.14 37.4,15.39 37.32,15.47 v3(37.32,15.72) R196.2 ; U2.E9 6.72,17.7 v1(6.36,18.06) ; U3.K8 12.07,28.69 11.92,28.55 v1(11.92,28.42) ; U2.F1 13.15,16.99 ; 46.59,13.71 46.62,13.69 U6.2 ; 3.72,10.43 3.93,10.43 ; C3.2 v3(21.19,8.1) ; U1.J7 U1.K7 24.66,15.82 v1(24.67,15.84) ; U3.N2 v3(10.97,25.69) ; U1.P10 26.16,16.78 v1(26.17,16.77) 26.16,16.75 U1.M10 ; v3(15.3,4.75) 15.15,4.9 C16.2 ; LED2.2 v1(53.07,9.96) ; v1(33.38,5.13) 33.47,5.22 33.49,5.22 ; v1(34.3,22.77) U1.AE25 U1.AD25 ; v1(29.04,25.43) 28.96,25.43 ; v1(34.07,25.53) 34.2,25.4 34.24,25.4 ; v1(12.73,18.84) 12.39,18.5 U2.D2 U2.E3 ; 18.2,5.48 22.04,5.48 ; U17.15 42.35,21.73 U17.33 ; U2.H1 13.71,15.3 v1(13.72,15.29) ; U2.A8 v1(7.89,21.24) ; v1(38.3,16.7) 37.69,16.7 R192.2 ; C153.2 31.05,25.57 v1(30.87,25.4) 30.85,25.42 30.81,25.42 ; U2.A2 v1(12.85,21.4) ; v1(14.51,28.35) 14.66,28.19 U3.E7 15.48,27.68 15.48,27.18 U3.C4 ; U1.A25 33.66,10.59 v1(33.52,10.45) 33.51,10.44 33.48,10.44 33.3,10.62 33.3,10.62 U1.A24 ; v1(22.89,27.71) 23.1,27.51 R20.2 ; 30.7,19.23 30.66,19.18 U1.U19 ; v1(7.12,18.9) 7.52,18.5 U2.D8 ; 25.07,25.41 25.07,26.08 25.08,26.09 v1(25.27,26.09) ; U1.M17 29.66,15.78 v1(29.67,15.77) 30.16,16.25 U1.M18 ; U2.B2 v1(12.8,20.56) ; 31.43,3.85 v1(31.67,3.85) ; U3.G5 13.97,27.24 14.46,27.74 v1(14.46,27.81) 13.59,27.81 U3.J5 ; v1(13.67,13.56) 13.54,13.7 U2.K1 ; v1(27.29,24.87) 27.31,24.89 27.47,24.89 27.62,24.74 R94.1 ; U3.P4 v1(10.17,26.69) ; 3.95,7.87 v1(3.72,7.64) ; U1.V10 U1.V9 ; v1(34.15,11.68) 34.15,11.53 33.88,11.27 U1.B25 ; U2.E1 13.15,17.15 v1(13.07,17.07) ; R141.2 20.15,3.52 v1(20.1,3.48) ; U1.T16 29.16,17.83 v1(29.11,17.79) 29.09,17.77 U1.R15 ; U2.E8 v1(7.89,18.04) ; 32.69,25.42 v1(32.77,25.42) ; U1.N15 29.07,16.77 v1(29.11,16.81) ; U2.H9 6.22,15.3 v1(6.21,15.31) ; R70.2 35.67,12.09 35.8,12.22 ; U2.T1 12.86,8.61 12.79,8.61 v1(12.71,8.53) ; v1(22.02,23.18) 21.66,22.82 U1.AE1 U1.AD1 ; U1.AE24 33.16,23.16 33.47,23.47 v1(33.99,23.47) ; v1(25.28,23.11) 25.16,22.98 U1.AE8 ; v1(18.65,10.91) 18.32,10.58 17.87,10.58 17.61,10.33 17.61,8.41 ; U2.M9 v1(6.41,11.76) ; U2.G8 7.53,16.1 v1(7.1,15.67) ; 21.66,9.94 U1.A1 21.29,10.77 ; v1(10.08,27.69) U3.P6 U3.N5 ; v1(31.53,6.15) 31.43,6.24 31.43,6.47 ; v1(17.83,17.4) 17.91,17.32 R88.1 ; 26.96,26.25 27.18,26.03 R131.2 ; v1(13.6,30.22) 13.47,30.09 U3.H10 ; U2.C9 6.44,19.61 v1(6.36,19.61) ; D8.1 6.36,23.98 ; v3(15.51,11.66) 15.72,11.86 R82.2 ; U6.3 45.97,13.27 U6.7 47.27,13.27 U6.1 ; U2.K9 v1(6.41,13.36) ; v1(29.16,23.23) U1.AE16 U1.AD16 ; X2.4 26.64,6.28 v1(26.7,6.22) 26.66,6.17 26.66,3.81 26.37,3.53 23.2,3.53 v1(23.07,3.66) 23.07,4.11 X2.2 ; SW1.1 SW1.3 ; LED4.2 53.07,8.48
  BOTTOM w0.305: R70.2 35.4,11.98 34.75,11.98 34.45,11.68 v1(34.15,11.68)
  BOTTOM w0.381: C175.2 29.12,25.51 v1(29.04,25.43) ; 48.61,21.82 49.07,21.82 ; 48.61,21.82 48.12,21.82 47.81,21.51 ; 48.61,21.82 48.01,21.23 ; 49.07,21.82 48.19,20.95 v1(48.19,20.78) ; 49.07,21.82 49.08,21.82 ; J14.S4 48.84,13.49 ; J14.S4 49.1,13.72 v1(48.5,14.32) 48.5,13.82 48.62,13.71 ; J14.S4 47.74,13.22 ; J14.S4 50.51,13.22 ; 48.84,13.49 48.62,13.71 ; 48.84,13.49 47.79,13.49 ; 49.08,21.82 48.85,21.6 48.85,20.93 v1(48.7,20.78) ; 49.08,21.82 J14.S2 50.35,21.82 ; 51.82,21.82 J14.S1 ; R131.2 27.24,25.27 27.24,24.92 v1(27.29,24.87) ; C203.2 v1(31.64,5.1) ; v1(34.07,25.53) 33.84,25.75 C150.2 ; J14.S3 52.05,13.22 ; v1(16.87,14.48) 17.11,14.48 17.11,14.52 R85.2 ; v1(12.81,10.96) U2.N1 13.51,11.66 v3(15.51,11.66) ; v1(32.77,25.42) 32.93,25.57 C172.2 ; 48.62,13.71 47.88,13.71
  BOTTOM w0.508: R261.2 38.77,1.8
  vias: v1(0.52,22.17) v1(0.52,20.01) v1(0.49,18.82) v1(0.49,15.98) v1(0.5,10.88) v1(0.49,9.75) v1(0.54,24.15) v1(0.54,17.17) v1(0.55,15.05) v1(0.54,13.92) v1(0.55,13.14) v1(0.54,12.01) v1(0.64,26.44) v1(0.9,7.21) v1(1.05,28.01) v1(1.36,6.02) v1(1.71,29.67) v1(2.04,4.85) v1(2.8,31.11) v1(2.78,3.83) v1(3.64,19.15) v1(3.82,2.79) v1(4.1,25.17) v1(4.2,32.49) v1(4.91,1.93) v1(5.04,20.67) v1(5.6,33.43) v1(6.46,1.17) v1(7.27,24.43) v1(7.6,34.19) v1(7.88,31.49) v1(8.01,24.38) v1(8.57,0.58) v1(8.83,23.49) v1(11.18,4.42) v1(17.08,24.59) v1(17.03,22.63) v1(17.23,7.87) v1(17.59,9.57) v1(17.66,7.92) v1(19.54,9.8) v1(20.02,24.97) v1(28.69,1.4) v1(30.77,28.6) v1(31.33,1.4) v1(33.49,3.85) v1(34.78,32.43) v1(36.51,12.62) v1(37.78,22.27) v1(38.01,4.57) v1(38.03,3.17) v1(38.03,2.56) v1(38.21,0.48) v1(38.39,21.33) v1(38.44,23.19) v1(38.49,22.26) v1(38.52,14.3) v1(38.57,24) v1(38.57,4.57) v1(38.59,3.2) v1(39.33,31.75) v1(39.71,32) v1(39.84,1.75) v1(40.34,20.09) v1(40.52,0.48) v1(40.65,10.62) v1(41.03,8.99) v1(41.13,18.62) v1(42.38,24.26) v1(42.81,23.44) v1(42.73,22.45) v1(43.14,2.74) v1(43.14,2.28) v1(43.14,0.51) v1(43.39,30.94) v1(43.39,30.48) v1(43.47,31.39) v1(43.7,15.9) v1(43.95,23.95) v1(43.95,23.06) v1(43.98,22.27) v1(43.95,21.56) v1(44.03,31.39) v1(44.05,30.91) v1(44.05,30.45) v1(44.1,16.31) v1(44.16,3.9) v1(44.36,9.4) v1(45.02,32.66) v1(45.07,34.49) v1(45.07,24.03) v1(45.09,23.06) v1(45.09,22.35) v1(45.07,21.56) v1(45.17,32.23) v1(45.17,31.77) v1(45.17,9.4) v1(45.22,12.01) v1(45.45,0.53) v1(46.67,4.14) v1(46.69,3.71) v1(47.13,19.48) v1(47.43,16.53) v1(47.43,16.1) v1(47.48,4.16) v1(47.48,3.73) v1(47.43,0.86) v1(48.14,33.96) v1(48.8,27.18) v1(48.95,14.27) v1(49.06,1.45) v1(49.21,26.29) v1(49.23,27.15) v1(49.62,33.27) v1(50.17,2.03) v1(50.83,32.46) v1(51.27,2.87) v1(51.9,31.47) v1(51.82,24.53) v1(52.18,3.81) v1(52.89,30.25) v1(52.99,4.9) v1(53.7,6.22) v1(53.73,28.6) v1(54.21,27.25) v1(54.19,7.77) v1(54.47,25.83) v1(54.49,24.48) v1(54.49,23.16) v1(54.47,21.16) v1(54.49,19.71) v1(54.49,18.26) v1(54.52,16.86) v1(54.49,15.62) v1(54.49,14.07) v1(54.49,12.29) v1(54.49,10.44) v1(54.44,9.47) v3(4.15,6.6) v3(4.73,11.56) v3(6.26,7.44) v3(7.98,6.12) v3(8.59,7.19) v3(9.74,13.61) v3(9.89,20.62) v3(9.91,16.86) v3(9.89,14.88) v3(9.89,6.65) v3(10.22,18.41) v3(10.42,7.01) v3(11.34,21.94) v3(12.61,6.4) v3(13.29,23.11) v3(13.67,8.76) v3(13.8,11.05) v3(14.13,12.37) v3(14.26,10.03) v3(14.56,17.7) v3(14.54,6.55) v3(14.69,8.66) v3(14.79,15.82) v3(14.87,19.84) v3(14.92,13.51) v3(15.27,11.07) v3(15.45,7.52) v3(15.5,6.5) v3(15.76,21.28) v3(15.88,19.4) v3(16.06,10.03) v3(16.42,15.87) v3(16.57,9.32) v3(16.98,7.06) v3(17.36,15.44) v3(17.43,5.51) v3(18.45,5.1) v3(19.95,5.21) v3(20.66,9.04) v3(21.27,10.26) v3(21.5,8.94) v3(21.5,7.54) v3(21.9,6.55) v3(22.03,33.86) v3(22.23,4.77) v3(23.02,32.74) v3(23.5,34.24) v3(23.73,28.17) v3(23.78,9.55) v3(23.86,8.18) v3(24.22,3.28) v3(24.34,29.01) v3(24.6,28.12) v3(24.65,32.59) v3(24.62,7.47) v3(25.1,34.36) v3(25.49,3.3) v3(25.74,32.71) v3(25.84,29.18) v3(25.84,27.96) v3(26.17,34.26) v3(26.53,29.06) v3(26.68,5.23) v3(27.03,28.17) v3(27.26,33.63) v3(27.97,33.63) v3(28.05,28.01) v3(28.32,6.36) v3(28.48,5.52) v3(28.56,33.63) v3(28.58,28.88) v3(28.56,6.02) v3(29.07,33.63) v3(29.07,33.27) v3(29.08,32.89) v3(29.04,5.84) v3(29.27,29.36) v3(31.28,29.28) v3(31.68,28.6) v3(32.5,28.52) v3(32.6,4.72) v3(32.72,3.45) v3(33.31,2.28) v3(34.38,31.72) v3(34.43,32.1) v3(36.41,34.14) v3(36.38,33.43) v3(37.42,28.62) v3(38.67,34.11) v3(38.69,24.99) v3(38.74,29.49) v3(39,26.34) v3(39.1,29.49) v3(39.07,28.07) v3(39.07,27.15) v3(39.35,32.13) v3(39.79,18.54) v3(40.5,34.11) v3(40.5,17.73) v3(41.39,16.86) v3(41.79,17.88) v3(42.35,33.53) v3(43.49,33.02) v3(46.01,16.58) v3(46.31,16.41) v3(46.74,16.31) v4(36.58,13.36) v4(36.64,13.97) v4(37.07,13.18) v4(37.37,12.34) v4(37.57,11.93) v4(37.57,11.26) v4(38.4,13.52) v4(38.43,12.58) v4(38.94,15.91) v4(38.94,15.25) v4(39.34,10.02) v4(40.6,13.89) v4(40.62,13.26) v4(41,13.26) v4(42.68,13.49) v4(45.58,13.36) v4(47.2,13.38)
